# Altium PCB DC116A_PCB.PcbDoc (part 1 of 5)
Units mil, origin at the board's own origin, x right, y up, seen from the top; angles counter-clockwise.
Board outline 3300 x 2000 mil, 4 copper layers (Top Layer, GND1, PWR SPLIT PLANE, Bottom Layer), stack 58.64 mil thick; 315 components, 191 nets, 877 pads, 364 vias.
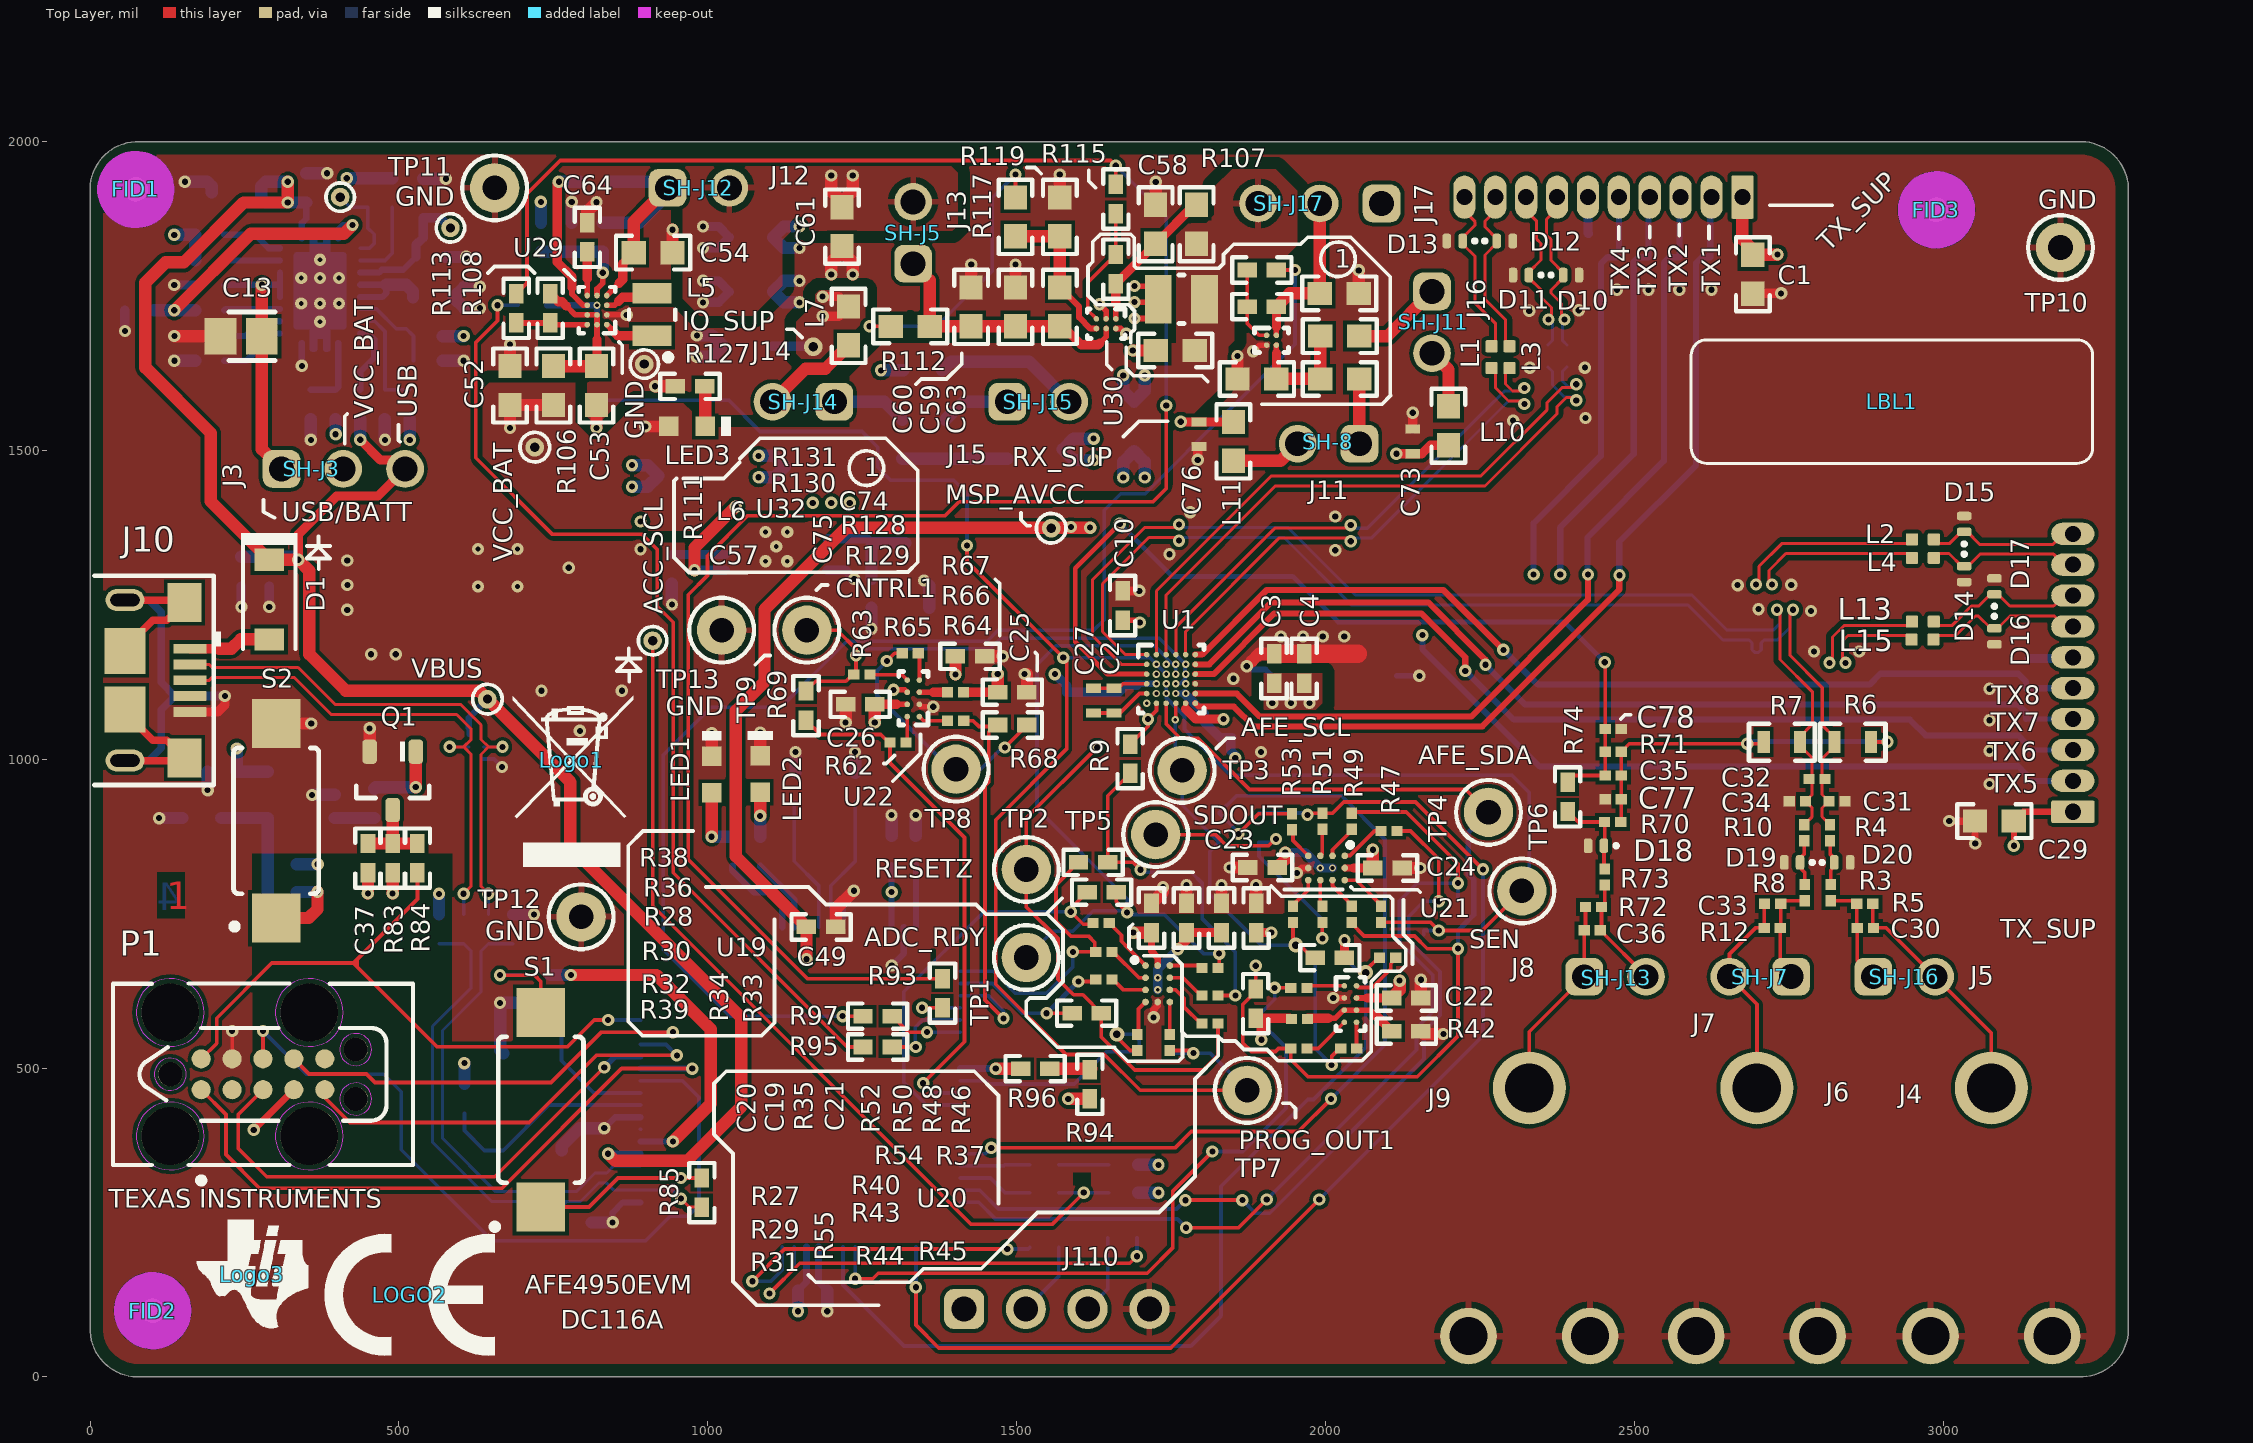
[diagram p0: Top Layer view]
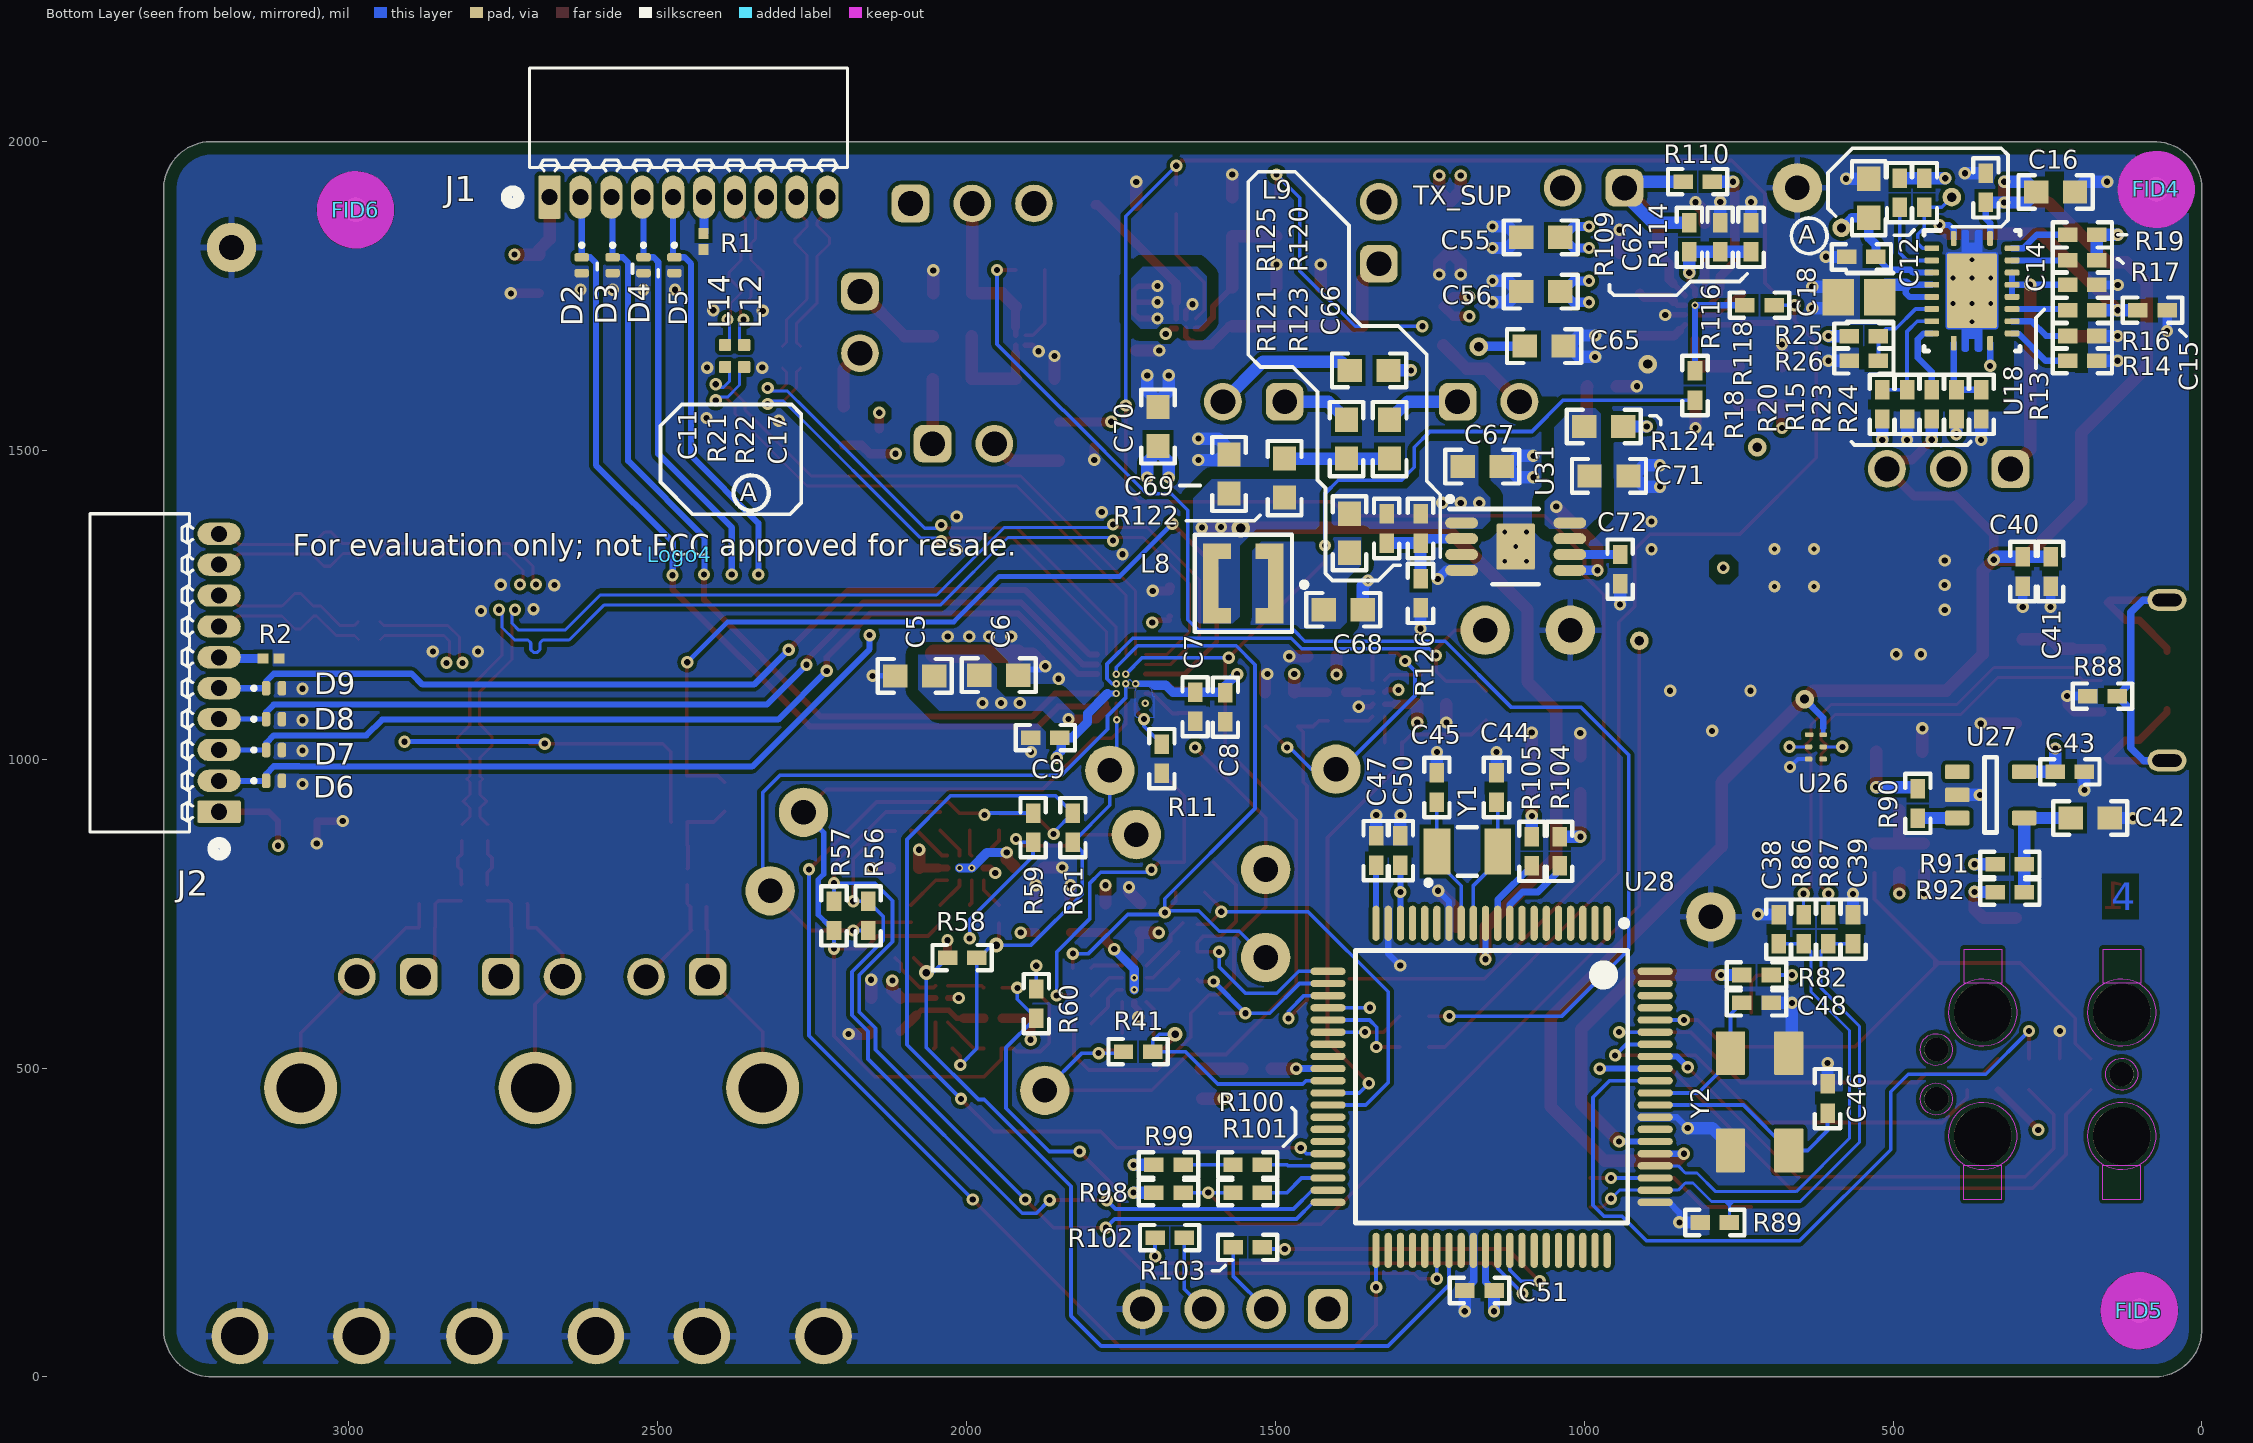
[diagram p1: Bottom Layer view, seen from below]
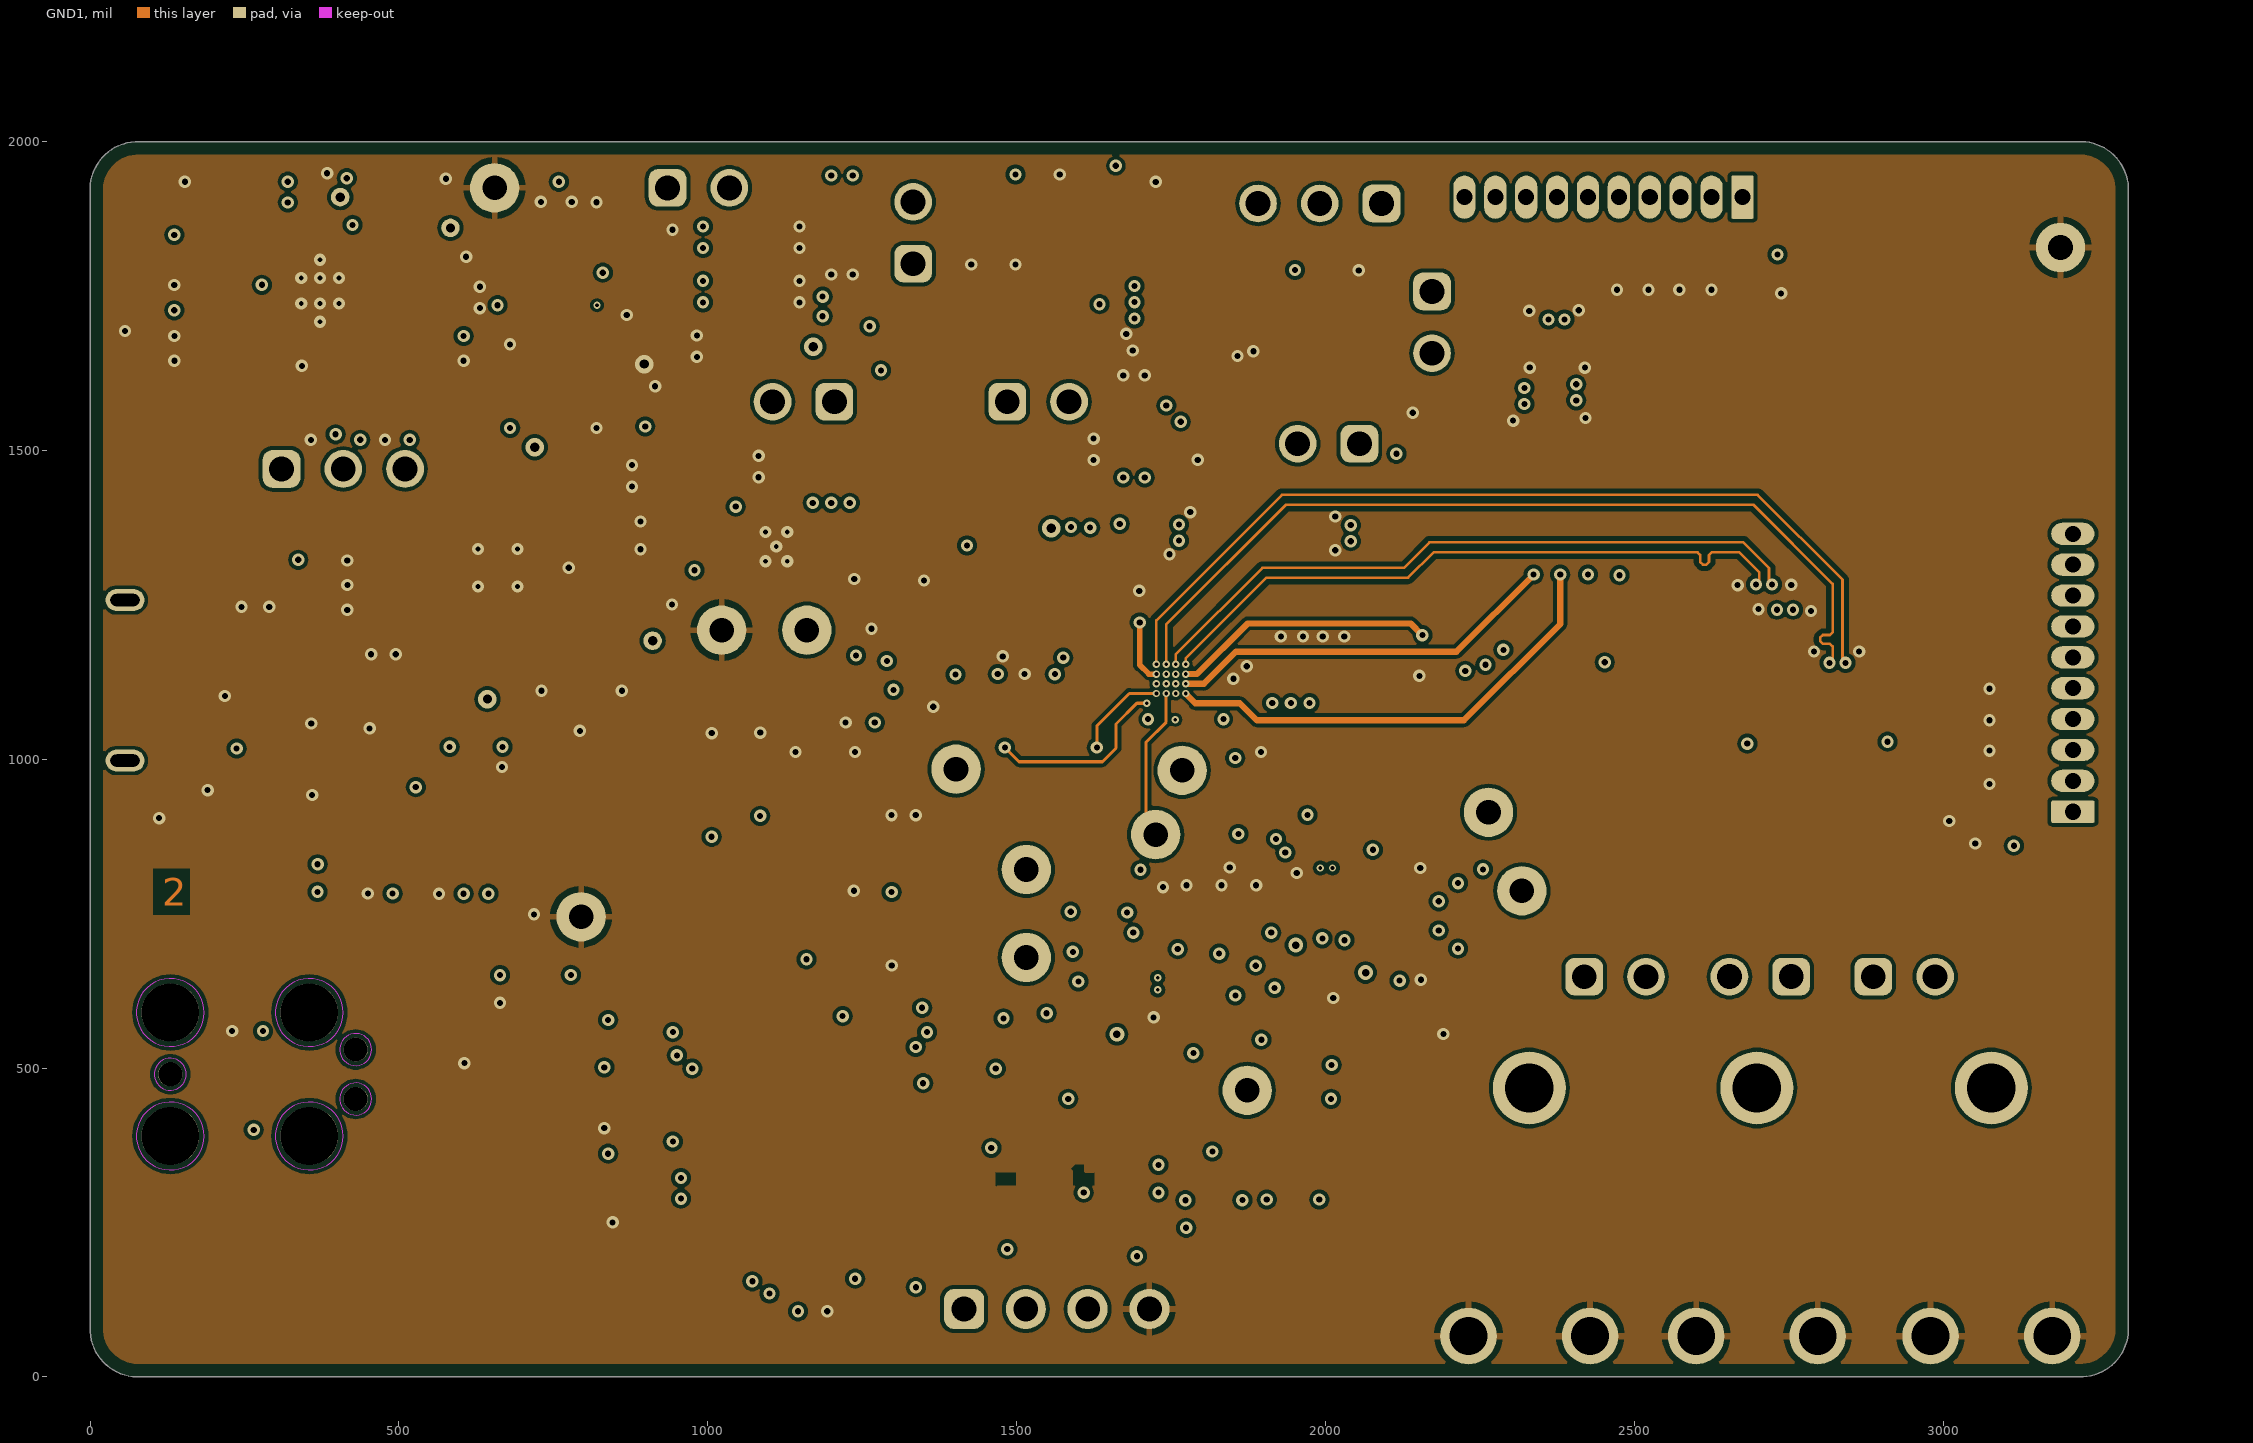
[diagram p2: GND1]
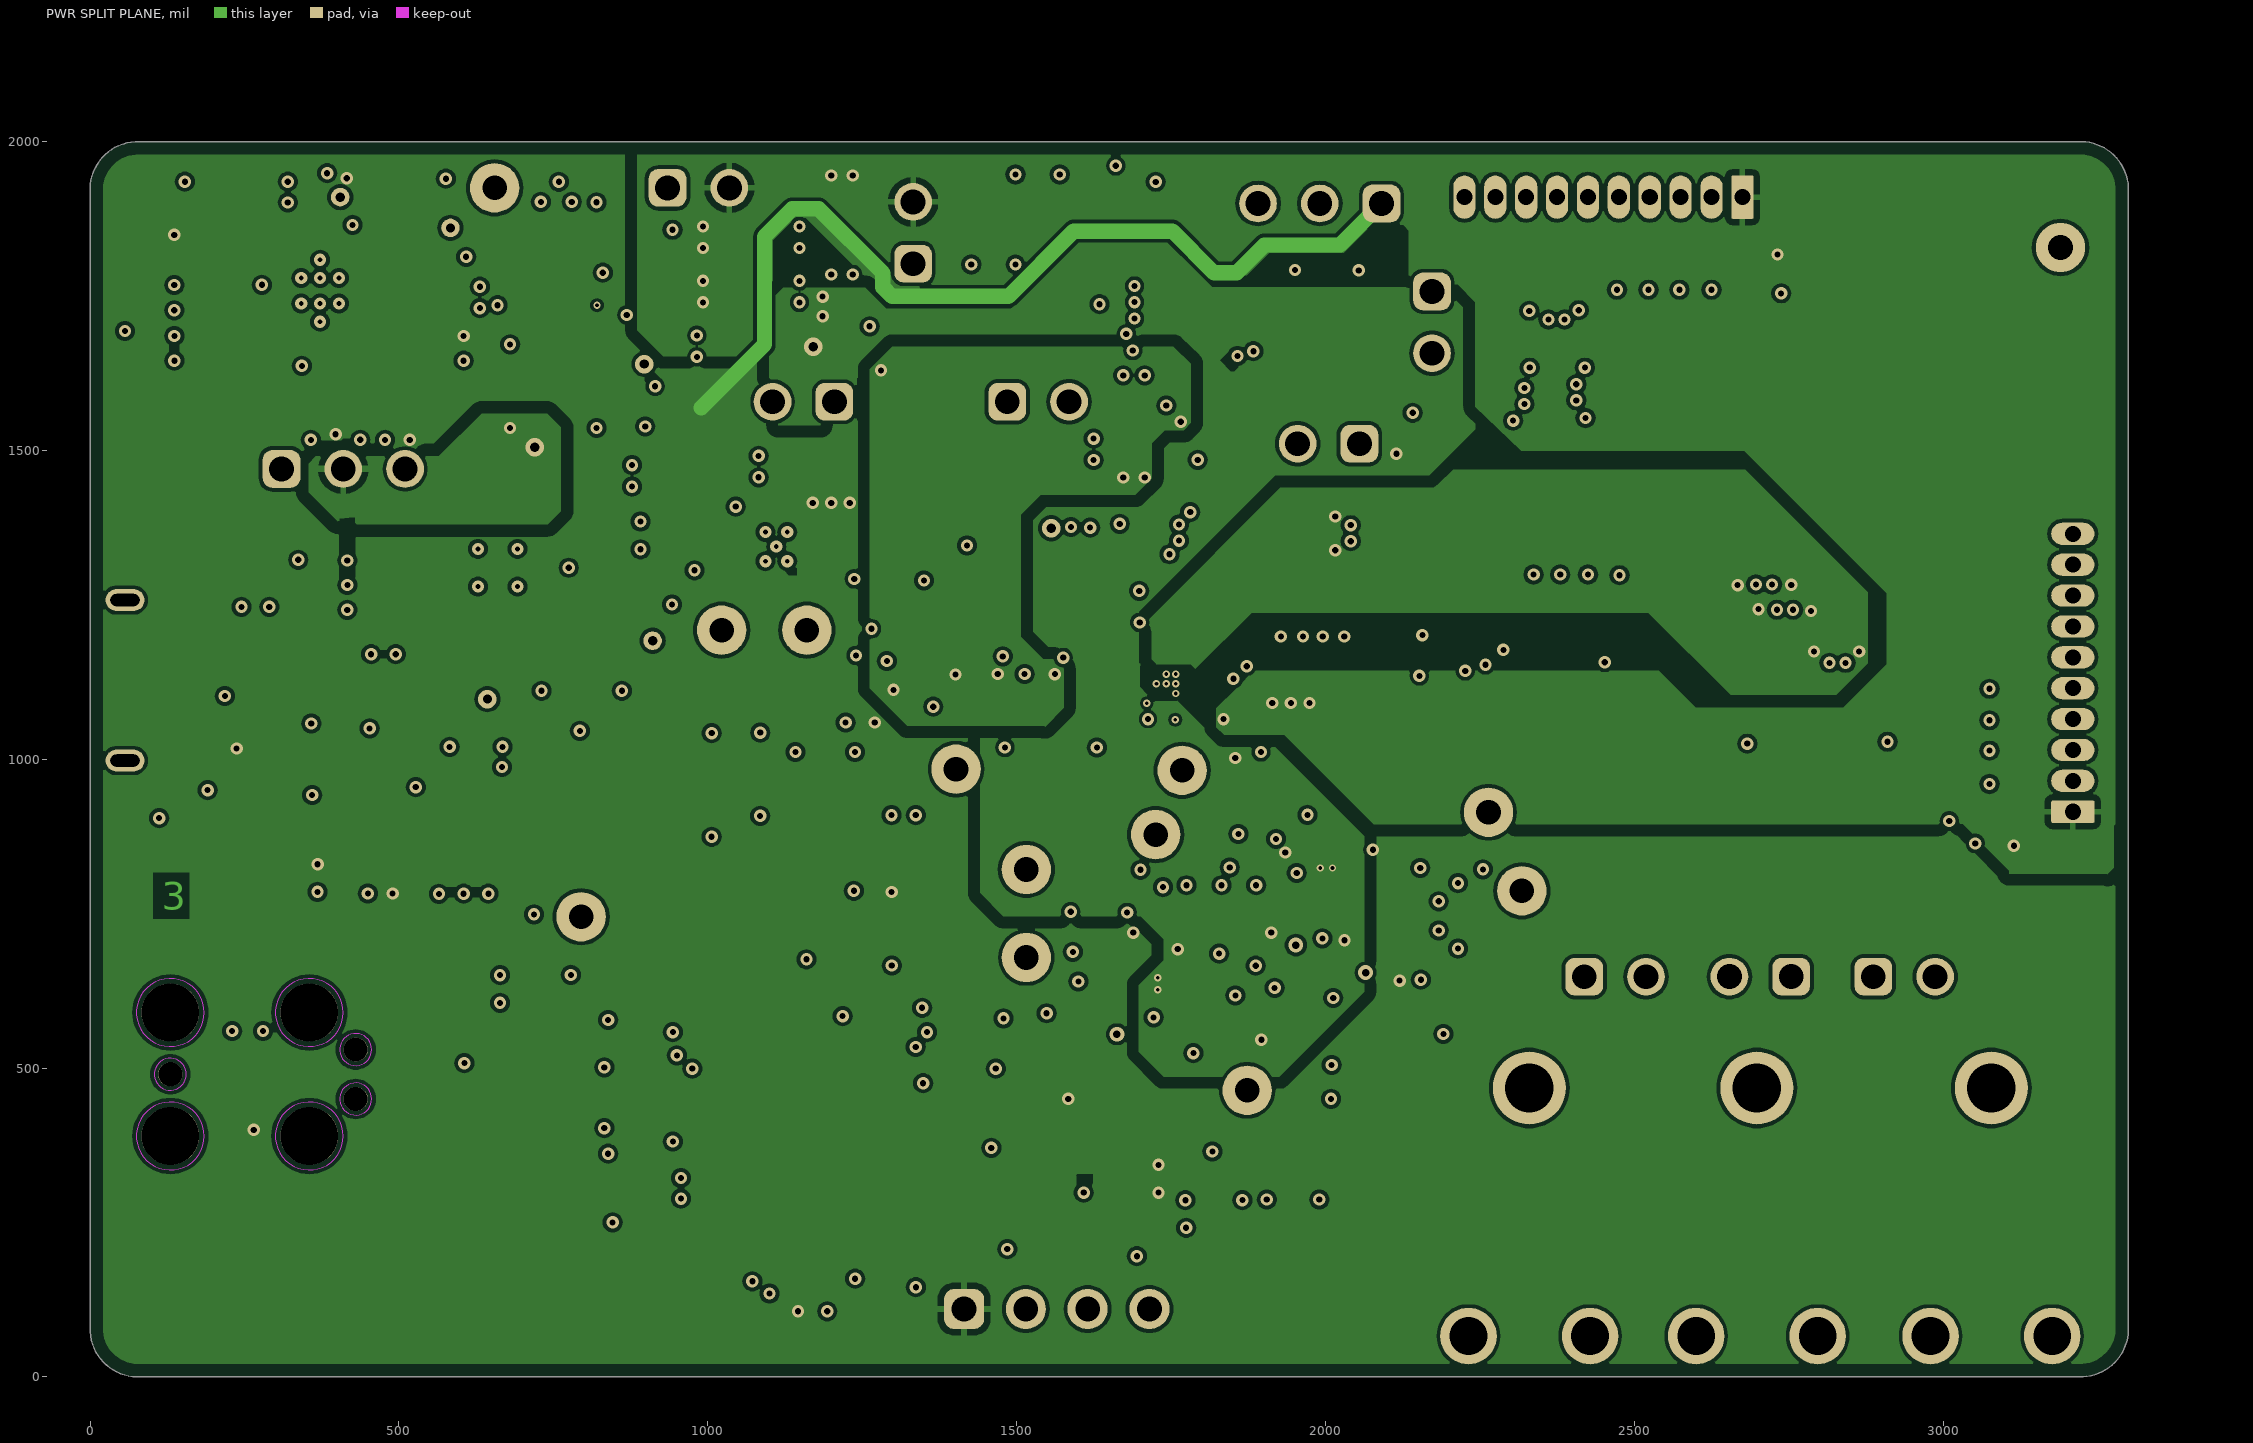
[diagram p3: PWR SPLIT PLANE]

## Layer stack, top to bottom
Top Solder: solder mask 0.4, Solder Resist, Dk 3.5
Top Layer: signal copper 0.579
Dielectric 1: dielectric 3.938, FR-4 HIGH Tg, Dk 4.2
GND1: signal copper 1.181
Dielectric2: core 47.244, FR-4 HIGH Tg, Dk 4.2
PWR SPLIT PLANE: signal copper 1.181
Dielectric3: prepreg 3.938, FR-4 HIGH Tg, Dk 4.2
Bottom Layer: signal copper 0.579
Bottom Solder: solder mask 0.4, Solder Resist, Dk 3.5

## Board outline
0,80 0,1924 cw(c78,1922) 80,2000 3224,2000 cw(c3222,1922) 3300,1920 3300,76 cw(c3222,78) 3220,0 76,0 cw(c78,78)

## Design rules (kind name [scope] priority, off if disabled: settings)
AcuteAngle [All] p1: minimum=4.50000000000000E+0001 checktracksonly=FALSE
AssemblyTestPointUsage [All] p1: valid=2
AssemblyTestpoint [All] p1 off: testpointundercomponent=TRUE minsize=30 maxsize=100 preferedsize=60 minholesize=0 maxholesize=40 preferedholesize=32 testpointgrid=1 usegrid=TRUE gridtolerance=0.01 allowsidetop=TRUE allowsidebottom=TRUE
BoardOutlineClearance BoardOutlineClearance_Poly [OnCopper and IsPoly] p1: gap=21 ignorepadtopadclearanceinfootprint=FALSE
Clearance U29 [WithinRoom('DC116_MSP430')] p1: gap=5 ignorepadtopadclearanceinfootprint=FALSE
Clearance u18 [WithinRoom('RoomDefinition')] p2: gap=5.9 ignorepadtopadclearanceinfootprint=FALSE except(5.2: Arc-Via Track-Via SMDPad-Via)
Clearance Clearance_P1 [HasFootprint('Tag_TC2050')or IsTrack vs IsKeepOut or IsFill] p3: gap=0 ignorepadtopadclearanceinfootprint=FALSE
Clearance Clearance_U1 [WithinRoom('111')] p4: gap=5 ignorepadtopadclearanceinfootprint=FALSE except(3.75: Via-Via; 4.5: Arc-Via Track-Via)
Clearance CONNECTORS [IsKeepOut vs InComponentClass('OVERLAPP')] p5: gap=0 ignorepadtopadclearanceinfootprint=FALSE
Clearance [InAnyDifferentialPair] p6: gap=5.99 ignorepadtopadclearanceinfootprint=FALSE except(8: Arc-Fill Arc-Poly Arc-Region Track-Fill Track-Poly Track-Region)
Clearance Clearance_Fiducial [IsKeepOut and InComponentClass('FiducialMark')] p7: gap=0 ignorepadtopadclearanceinfootprint=FALSE
Clearance DIFF_TO_SHAPE [InDifferentialPairClass('100') vs InNet('GND')] p8: gap=8 ignorepadtopadclearanceinfootprint=FALSE except(0: Arc-Hole Track-Hole SMDPad-Hole THPad-Hole Via-Hole Fill-Hole Poly-Hole Region-Hole Text-Hole; 7.5: SMDPad-SMDPad)
Clearance Clearance_1 [All] p9: gap=5.99 ignorepadtopadclearanceinfootprint=FALSE except(0: Arc-Hole Track-Hole SMDPad-Hole THPad-Hole Via-Hole Fill-Hole Poly-Hole Region-Hole Text-Hole; 2: Arc-Arc Arc-Track; 6: Via-Poly; 20: Poly-Poly)
Clearance SAMENET [All] p10: gap=3 ignorepadtopadclearanceinfootprint=FALSE except(0: Arc-SMDPad Track-Track Track-SMDPad Track-Poly Track-Region SMDPad-Via SMDPad-Hole Via-Region Region-Hole; 6: Arc-Fill Arc-Poly Arc-Region Track-Fill)
Clearance Clearance_Poly2poly [InPolygon vs InPolygon] p11: gap=15 ignorepadtopadclearanceinfootprint=FALSE except(0: Arc-Hole Track-Hole SMDPad-Hole THPad-Hole Via-Hole Fill-Hole Poly-Hole Region-Hole Text-Hole)
Clearance Clearance_Poly2NPTH [InComponent('P1') vs inpoly] p12: gap=12 ignorepadtopadclearanceinfootprint=FALSE except(0: Arc-Hole Track-Hole SMDPad-Hole THPad-Hole Via-Hole Fill-Hole Poly-Hole Region-Hole Text-Hole)
Clearance Clearance_Keepouts [((IsTrack Or IsArc) And Not InPoly) And IsFree and IsKeepOut vs ((IsTrack Or IsArc) And Not InPoly) And IsFree and IsKeepOut] p13: gap=0 ignorepadtopadclearanceinfootprint=FALSE
Clearance Clearance_Poly [InPolygon] p14: gap=8 ignorepadtopadclearanceinfootprint=FALSE except(0: Arc-Hole Track-Hole SMDPad-Hole THPad-Hole Via-Hole Fill-Hole Poly-Hole Region-Hole Text-Hole)
ComponentClearance ComponentClearance_Shunt [InComponentClass('Header') vs InComponentClass('Shunt')or HasFootprint('TE_881545-2')] p1: gap=0 collisioncheckmode=3 verticalgap=0 showdistances=FALSE
ComponentClearance [All] p2: gap=5 collisioncheckmode=3 verticalgap=5 showdistances=FALSE
ComponentClearance ComponentClearance_MountingHoles_FiducialMarks [InComponentClass('Mounting Holes') vs InComponentClass('FiducialMark')] p3: gap=50 collisioncheckmode=3 verticalgap=10 showdistances=FALSE
ComponentClearance ComponentClearance_Logo [InComponentClass('Logo')] p4: gap=50 collisioncheckmode=3 verticalgap=10 showdistances=FALSE
ComponentClearance ComponentClearance_ScrewToNut [(HasFootprint('NY PMS 440 0025 PH')) vs (HasFootprint('Keystone_1902C'))] p5: gap=5 collisioncheckmode=3 verticalgap=10 showdistances=FALSE
ComponentClearance ComponentClearance_MountingHoles [InComponentClass('Mounting Holes')] p6: gap=250 collisioncheckmode=3 verticalgap=100000 showdistances=FALSE
ComponentClearance ComponentClearance_SmallPassives [HasFootprint('0201*') or HasFootprint('0402*') or HasFootprint('0508') or HasFootprint('0603*') or HasFootprint('0612') or HasFootprint('0805*') or HasFootprint('0815*') or HasFootprint('0830*') or HasFootprint('1206*') or HasFootprint('1210*') or HasFootprint('1808*') or HasFootprint('1812*') or HasFootprint('1825*') or HasFootprint('2010*') or HasFootprint('2220*') or HasFootprint('2225*') or HasFootprint('2512*') or HasFootprint('2728*') or HasFootprint('3518*') vs HasFootprint('0201*') or HasFootprint('0402*') or HasFootprint('0508') or HasFootprint('0603*') or HasFootprint('0612') or HasFootprint('0805*') or HasFootprint('0815*') or HasFootprint('0830*') or HasFootprint('1206*') or HasFootprint('1210*') or HasFootprint('1808*') or HasFootprint('1812*') or HasFootprint('1825*') or HasFootprint('2010*') or HasFootprint('2220*') or HasFootprint('2225*') or HasFootprint('2512*') or HasFootprint('2728*') or HasFootprint('3518*')] p7: gap=14.96 collisioncheckmode=3 verticalgap=10 showdistances=FALSE
ComponentClearance ComponentClearance_THtoSMT [IsThruComponent vs IsSMTComponent] p8: gap=19 collisioncheckmode=3 verticalgap=30 showdistances=FALSE
ComponentClearance ComponentClearance_THtoTH [IsThruComponent vs IsThruComponent] p9: gap=25 collisioncheckmode=3 verticalgap=30 showdistances=FALSE
DiffPairsRouting 100_ohm [InDifferentialPairClass('All Differential Pairs')] p1: maxlimit=11.75 minlimit=11 mostfreqgap=11.75 toplayer_mingap=11.1 toplayer_maxgap=11.1 toplayer_prefgap=11.1 toplayer_minwidth=4.9 toplayer_maxwidth=4.9 toplayer_prefwidth=4.9 midlayer2_mingap=11.1 midlayer2_maxgap=11.1 midlayer2_prefgap=11.1 midlayer2_minwidth=4.9 midlayer2_maxwidth=4.9 midlayer2_prefwidth=4.9 midlayer3_mingap=11.75 midlayer3_minwidth=4.25 midlayer3_maxwidth=4.25 midlayer3_prefwidth=4.25 bottomlayer_maxgap=11 bottomlayer_prefgap=11 bottomlayer_minwidth=5 bottomlayer_maxwidth=5 bottomlayer_prefwidth=5 maxuncoupledlength=500
FabricationTestPointUsage TestPointUsage [All] p1: valid=2 allowmultiple=TRUE
FabricationTestpoint Testpoint [All] p1 off: side=3 testpointundercomponent=TRUE minsize=40 maxsize=100 preferedsize=60 minholesize=0 maxholesize=40 preferedholesize=32 testpointgrid=1 allowsidetop=TRUE allowsidebottom=TRUE usegrid=TRUE gridtolerance=0.01
FanoutControl Fanout_LCC [IsLCC] p1: bgadir=Out bgaviamode=Centered fanoutstyle=Auto fanoutdirection=Alternating viagrid=1 // Fanout_LCC (Default Rule)
FanoutControl Fanout_BGA [IsBGA] p2: bgadir=Out bgaviamode=Centered fanoutstyle=Auto fanoutdirection=Alternating viagrid=1 // Fanout_BGA (Default Rule)
FanoutControl Fanout_Default [All] p4: bgadir=Out bgaviamode=Centered fanoutstyle=Auto fanoutdirection=Alternating viagrid=1 // Fanout_Default (Default Rule)
FanoutControl Fanout_Small [(CompPinCount < 5)] p5: bgadir=Out bgaviamode=Centered fanoutstyle=Auto fanoutdirection=OutThenIn viagrid=1 // Fanout_Small (Default Rule)
HoleSize [All] p1: absolutevalues=TRUE maxlimit=251 minlimit=6 maxpercent=80.000 minpercent=20.000
HoleToHoleClearance [All] p1: gap=9.6 allowstackedmicrovias=TRUE
MinimumAnnularRing MinimumAnnularRing_J21 [InComponent('J21')] p1: minimumring=4.8
MinimumAnnularRing MinimumAnnularRing_Via [IsVia] p2: minimumring=2
MinimumAnnularRing MinimumAnnularRing_j22 [InComponent('J22')] p3: minimumring=4.8
MinimumAnnularRing MinimumAnnularRing_ThermalPadVias [IsVia and InAnyComponent] p4: minimumring=5.91
MinimumAnnularRing [All] p5: minimumring=5
MinimumSolderMaskSliver MinimumSolderMaskSliver_Logo [InComponentClass('Logo') vs InComponentClass('Logo')] p1: minsoldermaskwidth=0.7
MinimumSolderMaskSliver [All] p2: minsoldermaskwidth=3
PlaneConnect [All] p1: planeconnectstyle=Direct reliefexpansion=10 reliefentries=4 reliefconductorwidth=10 reliefairgap=10
PolygonConnect [All] p1: thpad.connectstyle=Relief thpad.reliefconductorwidth=10 thpad.reliefentries=4 thpad.polygonreliefangle="90 Angle" thpad.airgapwidth=10 smdpad.connectstyle=Direct smdpad.reliefconductorwidth=10 smdpad.reliefentries=4 smdpad.polygonreliefangle="90 Angle" smdpad.airgapwidth=10 via.connectstyle=Direct via.reliefconductorwidth=10 via.reliefentries=4 via.polygonreliefangle="90 Angle" via.airgapwidth=10
RoomDefinition 111 [False] p1: confinementstyle=ConfineIn formatcopy=TRUE lockcomponents=FALSE outline 1676,1189.49 1835.27,1189.49 1835.27,1052 1676,1052
RoomDefinition DC116_MSP430 [InComponentClass('DC116_MSP430')] p2: confinementstyle=ConfineOut formatcopy=TRUE lockcomponents=FALSE outline 760,1763.22 867.56,1763.22 867.56,1667 760,1667
RoutingVias [All] p1: holewidth=10 width=25 viastyle="Through Hole" minholewidth=6 minwidth=10 maxholewidth=25 maxwidth=65
SilkToBoardRegionClearance [Not ((IsComment or IsDesignator) And (Hide <> 'False')) and not InRegion(1000,500,4000,800)] p1:
SilkToSilkClearance SilkToSilkClearance_Pb-FreeLogo [(HasFootprint('Pb-Free_Overlay_Medium') OR HasFootprint('Pb-Free_Overlay_Small')) vs (HasFootprint('Pb-Free_Overlay_Medium') OR HasFootprint('Pb-Free_Overlay_Small'))] p1: silktosilkclearance=0
SilkToSilkClearance [All] p2: silktosilkclearance=3
SilkToSolderMaskClearance SilkToComponentPadClearance [(IsPad or IsFill or IsRegion) and InAnycomponent] p1: minsilkscreentomaskgap=2 clearancetoexposedcopper=TRUE
SilkToSolderMaskClearance "Silk to Solder Mask Opening" [All] p2: minsilkscreentomaskgap=2 clearancetoexposedcopper=FALSE
SolderMaskExpansion [All] p1: expansion=1.97
Width PWR [InNetClass('PWR')] p1: maxlimit=30 minlimit=6 preferedwidth=15
Width [All] p2: maxlimit=100 minlimit=5 preferedwidth=6 toplayer_minwidth=6 midlayer2_prefwidth=5 midlayer3_prefwidth=5 bottomlayer_minwidth=6 minimp=50.000000 maximp=50.000000 favimp=50.000000 checkconnectedcopper=TRUE
13 further rules are at their usual default settings.

## Classes and differential pairs
component class DC116_MSP430: C37 C38 C39 C40 C41 C42 C43 C44 C45 C46 C47 C48 C49 C50 C51 D1 J10 J110 LED1 LED2 P1 Q1 R82 R83 R84 R85 R86 R87 R88 R89 R90 R91 R92 R93 R94 R95 R96 R97 R98 R99 R100 R101 R102 R103 R104 R105 S1 S2 TP12 U26 U27 U28 Y1 Y2
component class Label: LBL1
component class DC116_Hardware: !PCB1 FID1 FID2 FID3 FID4 FID5 FID6 H2 LBL1 Logo1 LOGO2 Logo3 Logo4 PCB2 ZZ1 ZZ2 ZZ3 ZZ4
component class DC116_ECG: C30 C31 C32 C33 C34 C35 C36 C77 C78 D18 D19 D20 J4 J5 J6 J7 J8 J9 R3 R4 R5 R6 R7 R8 R10 R12 R70 R71 R72 R73 R74 SH-8 SH-J5 SH-J7
component class DC116_AFE4950: C1 C2 C3 C4 C5 C6 C7 C8 C9 C10 C27 C29 D2 D3 D4 D5 D6 D7 D8 D9 D10 D11 D12 D13 D14 D15 D16 D17 J1 J2 L1 L2 L3 L4 L12 L13 L14 L15 R1 R2 R9 R11 TP1 TP2 TP3 TP4 TP5 TP6 TP7 TP8 TP9 TP10 U1
component class Header: J3 J5 J7 J8 J11 J12 J13 J14 J15 J16 J17 J110
component class DC116_PwrMgmt: C52 C53 C54 C55 C56 C57 C58 C59 C60 C61 C62 C63 C64 C65 C66 C67 C68 C69 C70 C71 C72 C73 C74 C75 C76 J11 J12 J13 J14 J15 J16 J17 L5 L6 L7 L8 L9 L10 L11 LED3 R106 R107 R108 R109 R110 R111 R112 R113 R114 R115 R116 R117 R118 R119 R120 R121 R122 R123 R124 R125 R126 R127 R128 R129 R130 R131 SH-J11 SH-J12 SH-J13 SH-J14 SH-J15 SH-J16 SH-J17 TP13 U29 U30 U31 U32
component class DC116_Contd: C19 C20 C21 C22 C23 C24 C25 C26 R27 R28 R29 R30 R31 R32 R33 R34 R35 R36 R37 R38 R39 R40 R41 R42 R43 R44 R45 R46 R47 R48 R49 R50 R51 R52 R53 R54 R55 R56 R57 R58 R59 R60 R61 R62 R63 R64 R65 R66 R67 R68 R69 U19 U20 U21 U22
component class DC116_BatteryMgmt: C11 C12 C13 C14 C15 C16 C17 C18 J3 R13 R14 R15 R16 R17 R18 R19 R20 R21 R22 R23 R24 R25 R26 SH-J3 TP11 U18
component class Logo: Logo3
component class FiducialMark: FID1 FID2 FID3 FID4 FID5 FID6
component class AssemblyNote: ZZ1 ZZ2 ZZ3 ZZ4
differential pair IN_ECG: +IN_ECG_P -IN_ECG_N
differential pair IN4: +IN4_P -IN4_N
differential pair IN3: +IN3_P -IN3_N
differential pair PD4: +PD4_P -PD4_N
differential pair PD3: +PD3_P -PD3_N
differential pair PD2: +PD1_P -PD1_N
differential pair PD1: +PD2_P -PD2_N
differential pair MSP_USB: +MSP_USB_P -MSP_USB_N
differential pair MSP_USB_D: +MSP_USB_D_P -MSP_USB_D_N
differential pair IN: +IN_P -IN_N
differential pair IN2: +IN2_P -IN2_N

## Components (designator, comment, footprint, x,y, rotation, side; value= is the part's Value field where it differs from the comment)
C1 "Capacitor" 0603 2691.83,1785.09 r270 top value=10uF
C2 "GRM155R60J106ME44D" 0402_070 1657.76,1095 r90 top value=10uF
C3 "C1005X7R1H102M050BE" 0402 1916.84,1147 r90 top value=1000pF
C4 "0402YC104KAT2A" 0402 1965.52,1147 r270 top value=0.1uF
C5 "Capacitor" 0603 2084,1135 r0 bottom value=10uF
C6 "Capacitor" 0603 1948,1136 r180 bottom value=10uF
C7 "C1005X7R1H102M050BE" 0402 1630,1085 r270 bottom value=1000pF
C8 "0402YC104KAT2A" 0402 1581,1084.39 r90 bottom value=0.1uF
C9 "0402YC104KAT2A" 0402 1872.49,1035 r180 bottom value=0.1uF
C10 "0402YC104KAT2A" 0402 1671.81,1248.9 r270 top value=0.1uF
C11 "Capacitor" 0603 539.4,1908.19 r90 bottom locked value=10uF
C12 "0402YC104KAT2A" 0402 551.4,1813.19 r0 bottom value=0.1uF
C13 "Cap_Polarized" 2012-10 244.69,1684.71 r180 top locked value=22uF
C14 "0402YC104KAT2A" 0402 193.78,1767.87 r0 bottom locked value=0.1uF
C15 "0402YC104KAT2A" 0402 80,1727 r180 bottom value=0.1uF
C16 "EMK107BBJ106MA-T" 0603 236.91,1918.19 r180 bottom locked value=10uF
C17 "0402YC104KAT2A" 0402 350,1925 r270 bottom locked value=0.1uF
C18 "Cap_Polarized" 2012-10 555.05,1747.65 r0 bottom locked value=22uF
C19 "0402YC104KAT2A" 0402 1775.07,743.01 r90 top value=0.1uF
C20 "0402YC104KAT2A" 0402 1718.37,743.01 r270 top value=0.1uF
C21 "0402YC104KAT2A" 0402 1887.78,743.01 r270 top locked value=0.1uF
C22 "0402YC104KAT2A" 0402 2130.88,613.53 r0 top locked value=0.1uF
C23 "0402YC104KAT2A" 0402 1898.09,824.78 r180 top value=0.1uF
C24 "0402YC104KAT2A" 0402 2100.45,823.97 r180 top value=0.1uF
C25 "0402YC104KAT2A" 0402 1493.14,1108.5 r0 top value=0.1uF
C26 "0402YC104KAT2A" 0402 1246.82,1088.82 r0 top value=0.1uF
C27 "GRM155R60J106ME44D" 0402_070 1624.76,1095 r90 top value=10uF
C29 "Capacitor" 0603 3083,899.75 r180 top value=10uF
C30 "C0603X5R1E473K030BB" 0201_033 2874.01,727.02 r0 top value=0.047uF
C31 "GRM0335C1E470JA01D" 0201_033 2827.99,932 r0 top value=47pF
C32 "C0603C0G1E101J030BA" 0201_033 2795.99,968 r180 top value=100pF
C33 "C0603X5R1E473K030BB" 0201_033 2723.99,765.97 r180 top value=0.047uF
C34 "GRM0335C1E470JA01D" 0201_033 2763.99,932 r180 top value=47pF
C35 "C0603X5R1E102K030BA" 0201_033 2465.94,973.65 r0 top value=1000pF
C36 "C0603X5R1E473K030BB" 0201_033 2432,723 r180 top value=0.047uF
C37 "Capacitor" 0402 450,840 r270 top locked value=2200pF
C38 "500R07S100JV4T" 0402 685,725 r90 bottom locked value=10pF
C39 "500R07S100JV4T" 0402 565,725 r90 bottom locked value=10pF
C40 "0402YC104KAT2A" 0402 290,1304 r90 bottom value=0.1uF
C41 "Capacitor" 0402_065 245,1304 r270 bottom locked value=4.7uF
C42 "Capacitor" 0603 181,904.84 r180 bottom locked value=2.2uF
C43 "0402YC104KAT2A" 0402 213.88,979.65 r0 bottom value=0.1uF
C44 "CL05C120JB5NNNC" 0402 1142.13,954.3 r90 bottom locked value=12pF
C45 "CL05C120JB5NNNC" 0402 1238.58,954.3 r90 bottom locked value=12pF
C46 "500R07S100JV4T" 0402 606.14,450.68 r270 bottom locked value=10pF
C47 "04026D474KAT2A" 0402 1337.01,852.17 r90 bottom locked value=0.47uF
C48 "500R07S100JV4T" 0402 721.14,605.68 r180 bottom locked value=10pF
C49 "0402YC104KAT2A" 0402 1183.46,728.54 r180 top value=0.1uF
C50 "0402YC104KAT2A" 0402 1297.64,852.17 r270 bottom value=0.1uF
C51 "0402YC104KAT2A" 0402 1169.68,140 r180 bottom locked value=0.1uF
C52 "Capacitor" 0603 680,1605 r90 top locked value=10uF
C53 "Capacitor" 0603 820,1605 r270 top locked value=10uF
C54 "Capacitor" 0603 911.5,1820 r0 top locked value=10uF
C55 "Capacitor" 0603 1070.43,1845 r0 bottom locked value=10uF
C56 "Capacitor" 0603 1070.43,1757 r0 bottom value=10uF
C57 "Capacitor" 0603 1756.82,1661.73 r180 top locked value=10uF
C58 "TMK107BJ105KA-T" 0603 1725.17,1866.03 r90 top locked value=1uF
C59 "Capacitor" 0603 1498.23,1732.34 r90 top locked value=10uF
C60 "Capacitor" 0603 1426.51,1732.34 r90 top locked value=10uF
C61 "Capacitor" 0603 1217.41,1862.29 r270 top locked value=10uF
C62 "500R07S100JV4T" 0402 780,1845 r90 bottom locked value=10pF
C63 "AC0603JRNPOYBN220" 0603 1569.95,1732.34 r90 top locked value=22pF
C64 "C1005X7R1H102M050BE" 0402 805,1845 r90 top locked value=1000pF
C65 "EMK107BBJ106MA-T" 0603 1065,1668.74 r180 bottom value=10uF
C66 "Capacitor" 0402 1265,1373.62 r270 bottom locked value=0.01uF
C67 "EMK107BBJ106MA-T" 0603 1165,1473.74 r180 bottom value=10uF
C68 "EMK107BBJ106MA-T" 0603 1390,1242 r180 bottom value=10uF
C69 "EMK107BBJ106MA-T" 0603 1575,1461.73 r90 bottom value=10uF
C70 "EMK107BBJ106MA-T" 0603 1690,1538.74 r90 bottom locked value=10uF
C71 "EMK107BBJ106MA-T" 0603 960,1458.74 r180 bottom value=10uF
C72 "Capacitor" 0402 942,1307.83 r270 bottom locked value=0.01uF
C73 "GRM155R60J106ME44D" 0402_070 2141.2,1514.5 r90 top locked value=10uF
C74 "TMK107BJ105KA-T" 0603 2022.39,1754.28 r0 top locked value=1uF
C75 "TMK107BJ105KA-T" 0603 1889.09,1615.7 r180 top locked value=1uF
C76 "GRM155R60J106ME44D" 0402_070 1795.34,1526.15 r270 top locked value=10uF
C77 "GRM0335C1E470JA01D" 0201_033 2465.88,935.25 r180 top value=47pF
C78 "C0603C0G1E101J030BA" 0201_033 2466,1049 r0 top value=100pF
D1 "DIODE_SCHOTTKY" SOD-123 290,1258.45 r270 top locked value=40V
D2 "TPD1E04U04DPYR" DPY0002A#1 2623,1799.8 r270 bottom
D3 "TPD1E04U04DPYR" DPY0002A#1 2573,1799.8 r270 bottom
D4 "TPD1E04U04DPYR" DPY0002A#1 2523,1799.8 r270 bottom
D5 "TPD1E04U04DPYR" DPY0002A#1 2473,1799.8 r270 bottom
D6 "TPD1E04U04DPYR" DPY0002A#1 3121.2,965 r180 bottom
D7 "TPD1E04U04DPYR" DPY0002A#1 3121.2,1015 r180 bottom
D8 "TPD1E04U04DPYR" DPY0002A#1 3121.2,1065 r180 bottom
D9 "TPD1E04U04DPYR" DPY0002A#1 3121.2,1115 r180 bottom
D10 "TPD1E04U04DPYR" DPY0002A#2 2397.7,1783.88 r0 top
D11 "TPD1E04U04DPYR" DPY0002A#2 2316.45,1783.88 r180 top
D12 "TPD1E04U04DPYR" DPY0002A#2 2290.34,1839 r0 top
D13 "TPD1E04U04DPYR" DPY0002A#2 2209.16,1839 r180 top
D14 "TPD1E04U04DPYR" DPY0002A#2 3034,1299.64 r270 top
D15 "TPD1E04U04DPYR" DPY0002A#2 3034,1381 r90 top
D16 "TPD1E04U04DPYR" DPY0002A#2 3083,1199.03 r270 top
D17 "TPD1E04U04DPYR" DPY0002A#2 3083,1280 r90 top
D18 "TPD1E04U04DPYR" DPY0002A#2 2438,859.99 r180 top
D19 "TPD1E04U04DPYR" DPY0002A#2 2755.47,832.93 r180 top
D20 "TPD1E04U04DPYR" DPY0002A#2 2836.49,832.93 r0 top
FID1 "Fiducial" Fiducial10-30 74.11,1922.39 r180 top locked
FID2 "Fiducial" Fiducial10-30 101.45,107.35 r90 top locked
FID3 "Fiducial" Fiducial10-30 2989.05,1889.49 r0 top locked
FID4 "Fiducial" Fiducial10-30 74.11,1922.39 r180 bottom locked
FID5 "Fiducial" Fiducial10-30 101.45,107.35 r90 bottom locked
FID6 "Fiducial" Fiducial10-30 2989.05,1889.49 r180 bottom locked
J1 "Receptacle_10x1" CONN_851-43-010-20-001000 2450,1910 r0 bottom
J2 "Receptacle_10x1" CONN_851-43-010-20-001000 3210,1140 r270 bottom
J3 "Header_3x1" Samtec_TSW-103-07-T-S 410,1470 r0 top locked
J4 "41828" PlasticsOne_41828 3078,267 r0 top
J5 "Header_2x1" Samtec_TSW-102-07-T-S 2937,648.02 r0 top
J6 "41828" PlasticsOne_41828 2698.5,267 r0 top
J7 "Header_2x1" Samtec_TSW-102-07-T-S 2704,648.05 r180 top
J8 "Header_2x1" Samtec_TSW-102-07-T-S 2469,647.98 r0 top
J9 "41828" PlasticsOne_41828 2330,267 r0 top
J10 "CONN_USB_5Pos-6Shld" FCI_10118193-0001LF -0.42,1127.8 r270 top
J11 "Header_2x1" Samtec_TSW-102-07-T-S 2004.99,1510.87 r180 top locked
J12 "Header_2x1" Samtec_TSW-102-07-T-S 985,1925 r0 top locked
J13 "Header_2x1" Samtec_TSW-102-07-T-S 1332.51,1852.29 r90 top locked
J14 "Header_2x1" Samtec_TSW-102-07-T-S 1155,1578.74 r180 top locked
J15 "Header_2x1" Samtec_TSW-102-07-T-S 1535,1578.74 r0 top locked
J16 "Header_2x1" Samtec_TSW-102-07-T-S 2172.6,1707.35 r270 top locked
J17 "Header_3x1" Samtec_TSW-103-07-T-S 1990.89,1899.79 r180 top locked
J110 "Header_4x1" TSW-104-07-G-S 1565,110 r0 top locked
L1 "MMZ1005S182ET000" MMZ1005-E 2269,1650.87 r90 top
L2 "MMZ1005S182ET000" MMZ1005-E 2967.18,1356 r0 top
L3 "MMZ1005S182ET000" MMZ1005-E 2298,1650.87 r90 top
L4 "MMZ1005S182ET000" MMZ1005-E 2967.18,1326 r0 top
L5 "Inductor_Iron" DFE201612C 910,1720 r90 top locked value=1.5uH
L6 "Inductor_Iron" WE_LQS_252012 1766.93,1744.51 r180 top locked value=2.2uH
L7 "Ferrite_Bead" 0603 1228.15,1701.58 r90 top locked value="120 ohm"
L8 "Inductor_Iron" LPS3010 1552,1284.71 r0 bottom value=10uH
L9 "Ferrite_Bead" 0603 1348.37,1629.49 r180 bottom locked value="120 ohm"
L10 "Ferrite_Bead" 0603 2199,1540 r270 top value="120 ohm"
L11 "Ferrite_Bead" 0603 1851.03,1514.52 r90 top locked value="120 ohm"
L12 "MMZ1005S182ET000" MMZ1005-E 2360,1652.85 r90 bottom
L13 "MMZ1005S182ET000" MMZ1005-E 2967.18,1222.75 r0 top
L14 "MMZ1005S182ET000" MMZ1005-E 2391,1652.9 r90 bottom
L15 "MMZ1005S182ET000" MMZ1005-E 2966.57,1193.75 r0 top
LBL1 "THT-14-423-10" Label_650x200 2917,1579 r180 top
LED1 "LED" LED_SML-LX0603GW 1006.25,975 r90 top locked value=Green
LED2 "LED" SML-LX0603SRW_SuperRed 1084.84,975.89 r90 top value="Super Red"
LED3 "LED" LED_SML-LX0603GW 966.54,1538.74 r0 top locked value=Green
Logo1 "WEEE logo" WEEE_Minimum 780,998 r0 top
LOGO2 "CE Mark" CE_Mark_5mm 517.56,133 r0 top
Logo3 "Texas Instruments" TI_Symbol_Overlay_Small 263,166.49 r0 top
Logo4 "FCC disclaimer" FCC_disclaimer 2464,1331 r180 bottom
P1 "Tag_TC2050" Tag_TC2050 280,490 r90 top
Q1 "MMBT5089LT1G" SOT-23 490,965 r270 top locked value="25 V"
R1 "Resistor" 0201 2426,1838 r270 bottom value=0
R2 "Resistor" 0201 3126,1163 r180 bottom value=0
R3 "CRCW02010000Z0ED" 0201 2818,784.01 r90 top value=0
R4 "RC0201DR-07100KL" 0201 2817,880.99 r90 top value=100k
R5 "RC0201FR-0751KL" 0201 2873,765.97 r180 top value=51.0k
R6 "CRCW0603200MJPEAHR" 0603_HR 2853.53,1028 r180 top value=200Meg
R7 "CRCW0603200MJPEAHR" 0603_HR 2739,1028 r180 top value=200Meg
R8 "CRCW02010000Z0ED" 0201 2776,784.01 r90 top value=0
R9 "Resistor" 0402 1683.93,1001 r270 top value=499
R10 "RC0201DR-07100KL" 0201 2775,880.99 r90 top value=100k
R11 "Resistor" 0402 1683.93,1001 r90 bottom value=499k
R12 "RC0201FR-0751KL" 0201 2723.41,727.02 r0 top value=51.0k
R13 "Resistor" 0402 193.78,1727 r180 bottom locked value=47k
R14 "Resistor" 0402 193.78,1645.21 r0 bottom locked value=10.0k
R15 "Resistor" 0402 437.4,1574.43 r90 bottom locked value=10.0k
R16 "Resistor" 0402 193.78,1685.21 r180 bottom locked value=10.0k
R17 "Resistor" 0402 193.78,1807.87 r0 bottom locked value=10.0k
R18 "Resistor" 0402 517.4,1574.43 r90 bottom locked value=10.0k
R19 "Resistor" 0402 193.78,1849.06 r0 bottom locked value=10.0k
R20 "Resistor" 0402 477.4,1574.43 r90 bottom locked value=10.0k
R21 "Resistor" 0402 489.4,1917.19 r270 bottom locked value=10.0k
R22 "Resistor" 0402 449.4,1917.19 r270 bottom locked value=10.0k
R23 "Resistor" 0402 397.4,1574.43 r90 bottom locked value=10.0k
R24 "Resistor" 0402 357.4,1574.43 r270 bottom locked value=10.0k
R25 "Resistor" 0402 547.4,1685 r180 bottom locked value=10.0k
R26 "Resistor" 0402 547.4,1645 r0 bottom locked value=10.0k
R27 "Resistor" 0201 1812.93,662.08 r180 top locked value=0
R28 "Resistor" 0201 1636.87,734.88 r180 top value=0
R29 "Resistor" 0201 1812.94,617.57 r180 top locked value=0
R30 "Resistor" 0201 1641.29,688.15 r180 top locked value=0
R31 "Resistor" 0201 1812.94,572.26 r180 top locked value=0
R32 "Resistor" 0201 1641.29,643.4 r180 top locked value=0
R33 "Resistor" 0201 1748.08,541.52 r90 top locked value=0
R34 "Resistor" 0201 1695.36,541.52 r270 top locked value=0
R35 "Resistor" 0402 1831.76,743.01 r270 top locked value=499k
R36 "Resistor" 0402 1637.84,784.83 r0 top locked value=0
R37 "Resistor" 0201 2100.68,678.79 r180 top locked value=0
R38 "Resistor" 0402 1623.84,833.07 r180 top locked value=0
R39 "Resistor" 0402 1613.51,588.8 r180 top locked value=0
R40 "Resistor" 0201 1956.97,629.88 r0 top locked value=0
R41 "Resistor" 0402 1722.32,526.56 r0 bottom locked value=0
R42 "Resistor" 0402 2130.88,559.79 r180 top locked value=499k
R43 "Resistor" 0201 1957.91,579.31 r0 top value=0
R44 "Resistor" 0201 1956.97,531.78 r0 top locked value=0
R45 "Resistor" 0201 2037.81,531.78 r180 top locked value=0
R46 "Resistor" 0201 2090.1,748.93 r90 top locked value=0
R47 "Resistor" 0201 2103,884 r0 top value=0
R48 "Resistor" 0201 2042.58,748.93 r90 top locked value=0
R49 "Resistor" 0201 2042.58,899.58 r90 top locked value=0
R50 "Resistor" 0201 1995.05,748.93 r90 top locked value=0
R51 "Resistor" 0201 1995.05,899.58 r90 top locked value=0
R52 "Resistor" 0201 1947.53,748.93 r90 top locked value=0
R53 "Resistor" 0201 1946.07,898.79 r90 top value=0
R54 "Resistor" 0402 2007.17,678.79 r0 top locked value=10.0k
R55 "Resistor" 0402 1887.08,604.45 r270 top locked value=10.0k
R56 "Resistor" 0402 2159.27,746.4 r90 bottom locked value=0
R57 "Resistor" 0402 2214.57,746.4 r90 bottom locked value=0
R58 "Resistor" 0402 2007.17,678.79 r180 bottom locked value=0
R59 "Resistor" 0402 1892.29,889.21 r90 bottom locked value=0
R60 "Resistor" 0402 1887.08,604.45 r90 bottom locked value=0
R61 "Resistor" 0402 1827.89,889.21 r270 bottom locked value=0
R62 "Resistor" 0201 1308.06,1026.96 r180 top locked value=0
R63 "Resistor" 0201 1249.48,1136.99 r0 top locked value=0
R64 "Resistor" 0201 1401.34,1062.43 r0 top locked value=0
R65 "Resistor" 0201 1327.75,1171.52 r0 top locked value=0
R66 "Resistor" 0201 1401.31,1108.5 r0 top locked value=0
R67 "Resistor" 0402 1424.65,1166.51 r180 top locked value=499k
R68 "Resistor" 0402 1493.14,1055.43 r180 top locked value=0
R69 "Resistor" 0402 1159.13,1086.86 r90 top locked value=0
R70 "RC0201DR-07100KL" 0201 2464.99,898.25 r0 top value=100k
R71 "CRCW02010000Z0ED" 0201 2465.94,1012.25 r180 top value=0
R72 "RC0201FR-0751KL" 0201 2434,761 r0 top value=51.0k
R73 "CRCW02010000Z0ED" 0201 2452,809.53 r90 top value=0
R74 "CRCW040249K9FKED" 0402 2392,939 r90 top value=49.9k
R82 "Resistor" 0402 721.14,650.68 r180 bottom locked value=100
R83 "Resistor" 0402 490,840 r270 top locked value=47k
R84 "Resistor" 0402 530,840 r270 top locked value=0
R85 "Resistor" 0402 990.4,298.43 r90 top locked value=1.40k
R86 "Resistor" 0402 645,725 r90 bottom locked value=33
R87 "Resistor" 0402 605,725 r90 bottom locked value=33
R88 "Resistor" 0402 161,1102.21 r180 bottom locked value=33k
R89 "Resistor" 0402 788.62,250 r0 bottom locked value=1.00Meg
R90 "Resistor" 0402 460,928.46 r90 bottom locked value=100
R91 "Resistor" 0402 311.12,829.84 r0 bottom locked value=4.7k
R92 "Resistor" 0402 311.12,784.84 r180 bottom locked value=0
R93 "Resistor" 0402 1380,621.26 r270 top locked value=0
R94 "Resistor" 0402 1618.54,473.79 r270 top locked value=10.0k
R95 "Resistor" 0402 1275,534.17 r0 top locked value=0
R96 "Resistor" 0402 1530,499.21 r180 top locked value=10.0
R97 "Resistor" 0402 1275,584.17 r0 top locked value=0
R98 "Resistor" 0402 1673,298.35 r0 bottom locked value=4.7k
R99 "Resistor" 0402 1673,343.35 r0 bottom locked value=4.7k
R100 "Resistor" 0402 1545,343.35 r0 bottom locked value=10.0
R101 "Resistor" 0402 1545,298.35 r0 bottom locked value=10.0
R102 "Resistor" 0402 1671.14,225.54 r180 bottom locked value=0
R103 "Resistor" 0402 1544.83,209.73 r0 bottom locked value=0
R104 "Resistor" 0402 1040,851 r270 bottom locked value=220
R105 "Resistor" 0402 1085,851 r270 bottom locked value=130
R106 "Resistor" 0603 750,1605 r270 top locked value=0
R107 "Resistor" 0603 1791.58,1866.03 r90 top locked value=0
R108 "Resistor" 0402 745,1730 r270 top locked value=0
R109 "Resistor" 0402 830,1845 r90 bottom locked value=953k
R110 "Resistor" 0402 816.38,1935 r0 bottom locked value=1.00Meg
R111 "Resistor" 0402 1660.67,1793.5 r270 top value=0
R112 "Resistor" 0603 1327.77,1700.84 r0 top locked value=47
R113 "Resistor" 0402 690,1730 r270 top locked value=0
R114 "Resistor" 0402 730,1845 r270 bottom locked value=180k
R115 "Resistor" 0402 1660.67,1906.9 r270 top locked value=0
R116 "Resistor" 0402 820.75,1605 r90 bottom locked value=0
R117 "Resistor" 0603 1498.23,1878 r90 top locked value=1.00Meg
R118 "Resistor" 0402 716.38,1735 r0 bottom locked value=0
R119 "Resistor" 0603 1569.89,1878 r270 top locked value=255k
R120 "Resistor" 0603 1315,1518.23 r90 bottom locked value=0
R121 "Resistor" 0603 1380,1365.75 r270 bottom locked value=0
R122 "Resistor" 0603 1485,1455.24 r90 bottom locked value=0
R123 "Resistor" 0402 1320,1373.62 r90 bottom locked value=75.0k
R124 "Resistor" 0603 968.5,1538.74 r0 bottom locked value=0
R125 "Resistor" 0603 1385,1518.23 r90 bottom locked value=0
R126 "Resistor" 0402 1265,1268.62 r270 bottom locked value=47k
R127 "Resistor" 0402 971.38,1603.74 r180 top locked value=4.7k
R128 "Resistor" 0603 2023.07,1684.87 r0 top locked value=0
R129 "Resistor" 0603 2023.07,1615.63 r0 top locked value=0
R130 "Resistor" 0402 1896.96,1732.56 r0 top locked value=0
R131 "Resistor" 0402 1896.96,1792.05 r180 top locked value=0
S1 "SW_SPST-single" SW_RS-032G05A3-SM 729.76,432.58 r90 top locked
S2 "SW_SPST-single" SW_RS-032G05A3-SM 301.36,900.39 r90 top locked
SH-8 "881545-2" TE_881545-2 2004.76,1513.68 r180 top locked
SH-J3 "881545-2" TE_881545-2 359.22,1469.98 r0 top
SH-J5 "881545-2" TE_881545-2 1332.51,1852.29 r90 top locked
SH-J7 "881545-2" TE_881545-2 2704,648.04 r0 top
SH-J11 "881545-2" TE_881545-2 2174.27,1708.49 r90 top locked
SH-J12 "881545-2" TE_881545-2 985,1925 r180 top
SH-J13 "881545-2" TE_881545-2 2471,646 r0 top
SH-J14 "881545-2" TE_881545-2 1155,1578.74 r180 top locked
SH-J15 "881545-2" TE_881545-2 1535,1578.74 r180 top locked
SH-J16 "881545-2" TE_881545-2 2937,648.02 r0 top
SH-J17 "881545-2" TE_881545-2 1940.9,1899.79 r180 top locked
TP1 "5002" Keystone5002 1515.82,679.01 r90 top
TP2 "5002" Keystone5002 1515.82,821.53 r90 top
TP3 "5002" Keystone5002 1768,982 r90 top
TP4 "5002" Keystone5002 2264,914.16 r90 top
TP5 "5002" Keystone5002 1725.17,878 r90 top
TP6 "5002" Keystone5002 2318,787 r90 top
TP7 "5002" Keystone5002 1873.34,464 r90 top
TP8 "5002" Keystone5002 1402,984 r90 top
TP9 "5002" Keystone5002 1160.46,1208.98 r90 top
TP10 "5001" Keystone5001 3190,1828.4 r90 top
TP11 "5001" Keystone5001 655,1925 r0 top locked
TP12 "5001" Keystone5001 795,745 r0 top locked
TP13 "5001" Keystone5001 1022.48,1208.98 r0 top locked
U1 "AFE4950YGB" YBG0036-C01 1750,1130 r0 top
U18 "TI-BQ24032ARHL20-3050X2050TP" RHL0020A 372.43,1758.37 r180 bottom
U19 "TXB0104YZT" YZT0012ACAC 1728.4,636.48 r0 top
U20 "TXS0102YZP" YZP0008ADCD 2040.44,603.69 r0 top locked
U21 "TXB0104YZT" YZT0012ACAC 2001.65,823.97 r270 top locked
U22 "TI-TXB0102-YZP0008A-8" YZP0008ADAD 1332.87,1098.66 r180 top locked
U26 "TI-TPD4E004-SON_DRY-6" DRY0006A 625,1020 r180 bottom locked
U27 "TPS3825" DBV0005A_N 342,942.24 r180 bottom locked
U28 "TI-MSP430F552X_A-PN80" PN0080A_N 1150,469.69 r270 bottom locked
U29 "TPS6305x" YFF0012AFAF 820.75,1727.13 r180 top locked
U30 "TPS61099YFF" YFF0006AFAD 1644.92,1705.16 r270 top locked
U31 "TI-TPS7AXX01-YYDGN8-1760X1425TP" DGN0008D_N 1111,1344.24 r180 bottom locked
U32 "TPS727xxYFF" YFF0004AUAB_A1 1912.71,1678.41 r0 top locked
Y1 "Xtal" XTAL_ABS07 1189.37,850.68 r180 bottom locked
Y2 "XTAL_4P_13_G24" ABRACON_ABM3B 716.14,445.47 r0 bottom locked
ZZ1 "This Assembly Note is for PCB labels only" AssemblyNoteLabel 170,3310 r0 top
ZZ2 "These assemblies are ESD sensitive, ESD precautions shall be observed." AssemblyNote 170,3200 r0 top
ZZ3 "These assemblies must be clean and free from flux and all contaminants. Use of no clean flux is not acceptable." AssemblyNote 170,3110 r0 top
ZZ4 "These assemblies must comply with workmanship standards IPC-A-610 Class 2, unless otherwise specified." AssemblyNote 170,3020 r0 top

## Footprints (in the part's own frame and the unit in brackets; to place one, negate y for a bottom-side part, rotate by r counter-clockwise, add the part's x,y. Pads: shape width x height; smd on the part's side, far side on the other; paste and mask are expansions set on the pad)
0201 [mm] "Data from Kemet datasheet CC101_COM dated 7/28/11"
  rect 0.46x0.42 smd mask+0.048: 1(-0.33,0) 2(0.33,0)
  body extent -0.31,-0.16 0.31,0.16, height 0.26
0201_033 [mm] "SMD, 2-Leads, Height 0.33mm"
  rect 0.46x0.42 smd mask+0.048: 1(-0.33,0) 2(0.33,0)
  body extent -0.31,-0.16 0.31,0.16, height 0.33
0402 [mm] "0402 from SM-752 data"
  rect 0.8x0.6 smd: 1(-0.6,0) 2(0.6,0)
  silkscreen extent -1.22,-0.52 1.22,0.52, body extent -0.55,-0.3 0.55,0.3, height 0.6
0402_065 [mm] "0402"
  rect 0.8x0.6 smd: 1(-0.6,0) 2(0.6,0)
  silkscreen extent -1.22,-0.52 1.22,0.52, body extent -0.55,-0.3 0.55,0.3, height 0.65
0402_070 [mil] "SMD, 2-Leads, Body 1.2x0.7mm, Height 0.7mm"
  rect 15x24 smd: 1(-20,0) 2(20,0)
  body extent -24,-14 24,14, height 28
0603 [mm] "0603 from SM-752 data"
  rect 1x0.95 smd: 1(-0.8,0) 2(0.8,0)
  silkscreen extent -1.52,-0.69 1.52,0.69, body extent -0.87,-0.47 0.87,0.47, height 1
0603_HR [mm] "0603"
  rect 0.5x0.9 smd: 1(-0.75,0) 2(0.75,0)
  silkscreen extent -1.35,-0.75 1.35,0.77, body extent -0.82,-0.47 0.82,0.47, height 0.5
2012-10 [mm] "SMD, 2-Leads, Body 2.05x1.3mm"
  rect 1.3x1.5 smd: 1(-0.85,0) 2(0.85,0)
  silkscreen extent -1.4,-1 0.5,1, body extent -1.12,-0.75 1.12,0.75, height 1.01
ABRACON_ABM3B [mm] "ABRACON"
  rrect8% 1.2x1.8 smd: 1(-1.2,2) 2(-1.2,-2) 3(1.2,-2) 4(1.2,2)
  body extent -1.6,-2.5 1.6,2.5, height 1.11
AssemblyNote [mil] "Assembly Note"
AssemblyNoteLabel [mil] "Assembly Note for PCB Labels"
CE_Mark_5mm [mil] "Minimum text height for CE Mark"
  silkscreen extent -138,-98 138,98
CONN_851-43-010-20-001000 [mil] "Mill-max"
  rrect11% 36x70 hole 26 mask+2.36: 1(225,0)
  rrect100% 36x70 hole 26 mask+2.36: 2(175,0) 3(125,0) 4(75,0) 5(25,0) 6(-25,0) 7(-75,0) 8(-125,0) 9(-175,0) 10(-225,0)
  silkscreen extent -257,-209 295,10, body extent -257,-209 258,9, height 88
DBV0005A_N [mm] "SOT23, 5-Leads, Body 2.9x1.6mm, Pitch 0.95mm, Lead Span 2.8mm, IPC Medium Density"
  rrect17% 1x0.6 smd: 1(-1.375,0.95) 2(-1.375,0) 3(-1.375,-0.95) 4(1.375,-0.95) 5(1.375,0.95)
  silkscreen extent -0.25,-1.55 0.25,1.55, body extent -1.42,-1.46 1.42,1.46, height 1.09
DFE201612C [mm] "TOKO"
  rect 0.85x1.6 smd: 1(-0.875,0) 2(0.875,0)
  silkscreen extent -0.23,-0.95 0.2,0.95, body extent -1.1,-0.9 1.1,0.9, height 1.2
DGN0008D_N [mm] "TSOP, 8-Leads, Body 3x3mm, Pitch 0.65mm, Thermal Pad 1.89x1.57mm, IPC Medium Density"
  rrect100% 1.35x0.45 smd: 1(-2.225,0.975) 2(-2.225,0.325) 3(-2.225,-0.325) 4(-2.225,-0.975) 5(2.225,-0.975) 6(2.225,-0.325) 7(2.225,0.325) 8(2.225,0.975)
  rrect6% 1.57x1.89 smd: 9(0,0)
  silkscreen extent -2.73,-1.55 0.95,1.55, body extent -2.46,-1.5 2.46,1.5, height 1.1
DPY0002A#1 [mm] "X1SON-2"
  rrect57% 0.35x0.6 smd paste-0.5 mask-0.05: 1(-0.325,0) 2(0.325,0)
  rrect33% 0.3x0.5 on Bottom Paste: 1S(-0.35,0) 2S(0.35,0)
  silkscreen extent -0.85,-0.03 -0.8,0.02, body extent -0.5,-0.3 0.5,0.3, height 0.45
DPY0002A#2 [mm] "X1SON-2"
  rrect57% 0.35x0.6 smd paste-0.5 mask-0.05: 1(-0.325,0) 2(0.325,0)
  rrect33% 0.3x0.5 on Top Paste: 1S(-0.35,0) 2S(0.35,0)
  silkscreen extent -0.85,-0.02 -0.8,0.02, body extent -0.5,-0.3 0.5,0.3, height 0.45
DRY0006A [mm] "PSON, 6-Leads, Body 1x1.45mm, Pitch 0.5mm, TI Recommended"
  rrect50% 0.35x0.2 smd: 1(-0.275,0.5)
  rrect50% 0.3x0.2 smd: 2(-0.3,0) 3(-0.3,-0.5) 4(0.3,-0.5) 5(0.3,0) 6(0.3,0.5)
  body extent -0.5,-0.72 0.5,0.73, height 0.58
FCC_disclaimer [mil]
FCI_10118193-0001LF [mm] "Connector, Receptacle, USB Micro B, R/A, SMT"
  rect 0.4x1.35 smd: 1(-1.3,4.125) 2(-0.65,4.125) 3(0,4.125) 4(0.65,4.125) 5(1.3,4.125)
  oval 0.9x1.6 hole 0.5 slot 1.2 at 90 deg: 6(-3.3,1.45) 7(3.3,1.45)
  rect 1.6x1.4 smd: 8(-3.2,3.9) 9(3.2,3.9)
  rect 1.9x1.7 smd: 10(-1.2,1.45) 11(1.2,1.45)
  silkscreen extent -4.3,0.2 4.3,5.4, body extent -3.93,-1.45 3.93,4.5, height 3.51
Fiducial10-30 [mm]
  round 1 smd mask+1: 1(0,0)
  Top Layer keep-out circle w1.678: c0,0 r0.75
Keystone5001 [mil] "For Keystone 500x miniature loop terminals"
  round 80 hole 40: 1(0,0)
  silkscreen extent -52,-52 52,52, body extent -49,-49 49,49, height 182
Keystone5002 [mil] "For Keystone 500x miniature loop terminals"
  round 80 hole 40: 1(0,0)
  silkscreen extent -52,-52 52,52, body extent -49,-49 49,49, height 182
Label_650x200 [mil] "Thermal Transfer Label"
  round 1 on Mech13: 0(0,0)
  silkscreen extent -325,-100 325,100, body extent -325,-100 325,100, height 1
LED_SML-LX0603GW [mm] "LUMEX OPTO"
  rect 0.8x0.8 smd: 1(-0.75,0) 2(0.75,0)
  silkscreen extent 1.4,-0.4 1.8,0.4, body extent -0.8,-0.4 0.8,0.4, height 0.6
LPS3010 [mm] "Coilcraft recommended land pattern.  Document 428-2, rev 10/6/08"
  rect 0.63x3.3 smd: 1(-1.335,0) 2(1.335,0)
  rect 1.14x0.64 smd: 1(-1.08,-1.33) 1(-1.08,1.33) 2(1.08,-1.33) 2(1.08,1.33)
  silkscreen extent -2.59,-2 2,2, body extent -1.58,-1.58 1.58,1.58, height 1.02
MMZ1005-E [mm] "SMD, 2-Leads, Body 1x0.5mm"
  rrect20% 0.5x0.5 smd: 1(-0.45,0) 2(0.45,0)
  body extent -0.53,-0.28 0.53,0.28, height 0.55
PlasticsOne_41828 [mm] "Touchproof Jack, R/A, TH"
  round 3 hole 2: 1(0,5.1)
  round 2.325 hole 1.55: 2(-2.5,-5.1) 3(2.5,-5.1)
  body extent -3.95,-12.29 3.95,6.79, height 6.4
PN0080A_N [mm] "QFP, 80-Leads, Body 12x12mm, Pitch 0.5mm, IPC Medium Density"
  oval 1.45x0.3 smd: 1(-6.725,4.75) 2(-6.725,4.25) 3(-6.725,3.75) 4(-6.725,3.25) 5(-6.725,2.75) 6(-6.725,2.25) 7(-6.725,1.75) 8(-6.725,1.25) 9(-6.725,0.75) 10(-6.725,0.25) 11(-6.725,-0.25) 12(-6.725,-0.75) 13(-6.725,-1.25) 14(-6.725,-1.75) 15(-6.725,-2.25) 16(-6.725,-2.75) 17(-6.725,-3.25) 18(-6.725,-3.75) 19(-6.725,-4.25) 20(-6.725,-4.75) 41(6.725,-4.75) 42(6.725,-4.25) 43(6.725,-3.75) 44(6.725,-3.25) 45(6.725,-2.75) 46(6.725,-2.25) 47(6.725,-1.75) 48(6.725,-1.25) 49(6.725,-0.75) 50(6.725,-0.25) 51(6.725,0.25) 52(6.725,0.75) 53(6.725,1.25) 54(6.725,1.75) 55(6.725,2.25) 56(6.725,2.75) 57(6.725,3.25) 58(6.725,3.75) 59(6.725,4.25) 60(6.725,4.75)
  oval 0.3x1.45 smd: 21(-4.75,-6.725) 22(-4.25,-6.725) 23(-3.75,-6.725) 24(-3.25,-6.725) 25(-2.75,-6.725) 26(-2.25,-6.725) 27(-1.75,-6.725) 28(-1.25,-6.725) 29(-0.75,-6.725) 30(-0.25,-6.725) 31(0.25,-6.725) 32(0.75,-6.725) 33(1.25,-6.725) 34(1.75,-6.725) 35(2.25,-6.725) 36(2.75,-6.725) 37(3.25,-6.725) 38(3.75,-6.725) 39(4.25,-6.725) 40(4.75,-6.725) 61(4.75,6.725) 62(4.25,6.725) 63(3.75,6.725) 64(3.25,6.725) 65(2.75,6.725) 66(2.25,6.725) 67(1.75,6.725) 68(1.25,6.725) 69(0.75,6.725) 70(0.25,6.725) 71(-0.25,6.725) 72(-0.75,6.725) 73(-1.25,6.725) 74(-1.75,6.725) 75(-2.25,6.725) 76(-2.75,6.725) 77(-3.25,6.725) 78(-3.75,6.725) 79(-4.25,6.725) 80(-4.75,6.725)
  silkscreen extent -6.85,-5.6 5.6,5.6, body extent -7,-7 7,7, height 1.56
RHL0020A [mm] "QFN, 20-Leads, Body 4.5x3.5mm, Pitch 0.5mm, Thermal Pad 3.05x2.05mm, TI Recommended"
  rrect42% 0.24x0.6 smd: 1(-0.75,2.15) 10(-0.75,-2.15) 11(0.75,-2.15) 20(0.75,2.15)
  rrect42% 0.6x0.24 smd: 2(-1.65,1.75) 3(-1.65,1.25) 4(-1.65,0.75) 5(-1.65,0.25) 6(-1.65,-0.25) 7(-1.65,-0.75) 8(-1.65,-1.25) 9(-1.65,-1.75) 12(1.65,-1.75) 13(1.65,-1.25) 14(1.65,-0.75) 15(1.65,-0.25) 16(1.65,0.25) 17(1.65,0.75) 18(1.65,1.25) 19(1.65,1.75)
  rrect12% 0.92x0.85 on Bottom Paste: 21(-0.56,-1.05) 21(-0.56,0) 21(-0.56,1.05) 21(0.56,-1.05) 21(0.56,0) 21(0.56,1.05)
  rrect5% 2.05x3.05 smd paste-2 mask+0: 21(0,0)
  Top Layer region: -0.975,-1.575 -0.425,-1.575 -0.425,-2.4 -0.417,-2.438 -0.396,-2.471 -0.363,-2.492 -0.325,-2.5 -0.325,-2.5 -0.225,-2.5 -0.187,-2.492 -0.154,-2.471 -0.133,-2.438 -0.125,-2.4 -0.125,-2.4 -0.125,-1.975 0.125,-1.975 0.125,-2.4 0.133,-2.438 0.154,-2.471 0.187,-2.492 0.225,-2.5 0.225,-2.5 0.325,-2.5 0.363,-2.492 0.396,-2.471 0.417,-2.438 0.425,-2.4 0.425,-2.4 0.425,-1.575 0.975,-1.575 1.013,-1.567 1.046,-1.546 1.067,-1.513 1.075,-1.475 1.075,-1.475 1.075,1.475 1.067,1.513 1.046,1.546 1.013,1.567 0.975,1.575 0.975,1.575 0.425,1.575 0.425,2.4 0.417,2.438 0.396,2.471 0.363,2.492 0.325,2.5 0.325,2.5 0.225,2.5 0.187,2.492 0.154,2.471 0.133,2.438 0.125,2.4 0.125,2.4 0.125,1.975 -0.125,1.975 -0.125,2.4 -0.133,2.438 -0.154,2.471 -0.187,2.492 -0.225,2.5 -0.225,2.5 -0.325,2.5 -0.363,2.492 -0.396,2.471 -0.417,2.438 -0.425,2.4 -0.425,2.4 -0.425,1.575 -0.975,1.575 -1.013,1.567 -1.046,1.546 -1.067,1.513 -1.075,1.475 -1.075,1.475 -1.075,-1.475 -1.067,-1.513 -1.046,-1.546 -1.013,-1.567 -0.975,-1.575
  silkscreen extent -1.98,-2.47 1.98,2.47, body extent -1.75,-2.25 1.75,2.25, height 1.01
Samtec_TSW-102-07-T-S [mm] "Header, 2.54 mm, 2x1, Tin, TH"
  rrect50% 1.55x1.55 hole 1.02: 1(-1.27,0)
  round 1.55 hole 1.02: 2(1.27,0)
  body extent -2.54,-1.27 2.54,1.27, height 8.38
Samtec_TSW-103-07-T-S [mm] "Header, 2.54 mm, 3x1, TH"
  rrect50% 1.55x1.55 hole 1.02: 1(-2.54,0)
  round 1.55 hole 1.02: 2(0,0) 3(2.54,0)
  body extent -3.81,-1.27 3.81,1.27, height 8.39
SML-LX0603SRW_SuperRed [mm] "Lumex Opto/Components Inc"
  rect 0.8x0.8 smd: 1(-0.75,0) 2(0.75,0)
  silkscreen extent 1.4,-0.53 1.78,0.52, body extent -0.92,-0.53 0.92,0.53, height 1.1
SOD-123 [mm] "On Semi recommended land pattern"
  rect 0.915x1.22 smd: 1(-1.637,0) 2(1.637,0)
  silkscreen extent -2.74,-1.17 2.03,1.17, body extent -1.93,-0.9 1.93,0.9, height 1.35
SOT-23 [mm] "SOT23, 3-Leads, Body 2.9x1.3mm, Pitch 0.95mm, Lead Span 2.5mm, IPC Medium Density"
  rrect50% 1x0.6 smd: 1(-1.2,0.95) 2(-1.2,-0.95) 3(1.2,0)
  silkscreen extent -1.63,-1.5 0.7,1.5, body extent -1.16,-1.45 1.21,1.45, height 1
SW_RS-032G05A3-SM [mm] "SMT, 2-Leads, Body 6x3.5mm, Pin Spacing 8mm"
  rect 2x2 smd: 1(-4,0) 2(4,0)
  silkscreen extent -3,-1.75 3,1.75, body extent -4,-1.75 4,1.75, height 4.3
Tag_TC2050 [mil] "Footprint for Tag-Connect TC2050 cables"
  round 31 smd paste-15.75: 1(-25,100) 2(-25,50) 3(-25,0) 4(-25,-50) 5(-25,-100) 6(25,-100) 7(25,-50) 8(25,0) 9(25,50) 10(25,100)
  round 39 hole 39 unplated: MH1(0,150) MH2(-40,-150) MH3(40,-150)
  round 93.5 hole 93.5 unplated: MH4(-100,150) MH5(100,150) MH6(-100,-75) MH7(100,-75)
  Bottom Layer keep-out region: -147,119.5 -147,180.05 -202.75,180.05 -202.75,119.5
  Bottom Layer keep-out region: 147,180.5 147,119.95 202.75,119.95 202.75,180.5
  Bottom Layer keep-out region: -147,-105.5 -147,-44.95 -202.75,-44.95 -202.75,-105.5
  Bottom Layer keep-out region: 147,-44.5 147,-105.05 202.75,-105.05 202.75,-44.5
  silkscreen extent -177,-243 147,243
TE_881545-2 [mil] "TE"
  round 1 on Mech3: 0(0,0)
  body extent -99,-49 99,49, height 530
TI_Symbol_Overlay_Small [mil]
  silkscreen extent -90,-88 91,88
TSW-104-07-G-S [mm] "Samtec 100mil, 1x4, 230 mil above insulator"
  rrect50% 1.65x1.65 hole 1.016: 1(-3.81,0)
  round 1.65 hole 1.016: 2(-1.27,0) 3(1.27,0) 4(3.81,0)
  body extent -5.08,-1.27 5.08,1.27, height 8.38
WE_LQS_252012 [mm] "SMD, 2-Leads, Body 2.5x2mm, Pitch 1.9mm"
  rect 1.1x2 smd: 1(-0.95,0) 2(0.95,0)
  silkscreen extent -0.1,-1 0.1,1, body extent -1.25,-1 1.25,1, height 1.2
WEEE_Minimum [mil] "WEEElie bin"
  silkscreen extent -95,-172 99,104
XTAL_ABS07 [mm] "ABRACON"
  rect 1.1x1.9 smd: 1(-1.25,0) 2(1.25,0)
  silkscreen extent -0.4,-1 0.4,1, body extent -1.65,-0.8 1.65,0.8, height 0.9
YBG0036-C01 [mm] "DSBGA-36"
  round 0.23 smd paste-0.2 mask+0.038: A1(-1,1) A2(-0.6,1) A3(-0.2,1) A4(0.2,1) A5(0.6,1) A6(1,1) B1(-1,0.6) B2(-0.6,0.6) B3(-0.2,0.6) B4(0.2,0.6) B5(0.6,0.6) B6(1,0.6) C1(-1,0.2) C2(-0.6,0.2) C3(-0.2,0.2) C4(0.2,0.2) C5(0.6,0.2) C6(1,0.2) D1(-1,-0.2) D2(-0.6,-0.2) D3(-0.2,-0.2) D4(0.2,-0.2) D5(0.6,-0.2) D6(1,-0.2) E1(-1,-0.6) E2(-0.6,-0.6) E3(-0.2,-0.6) E4(0.2,-0.6) E5(0.6,-0.6) E6(1,-0.6) F1(-1,-1) F2(-0.6,-1) F3(-0.2,-1) F4(0.2,-1) F5(0.6,-1) F6(1,-1)
  silkscreen extent -1.35,-1.4 1.35,1.4, body extent -1.25,-1.3 1.25,1.3, height 0.5
YFF0004AUAB_A1 [mm] "DSBGA, 4-Balls, Body 1.19x0.82mm"
  round 0.23 smd paste-0.13 mask+0.04: A1(-0.2,0.2) A2(0.2,0.2) B1(-0.2,-0.2) B2(0.2,-0.2)
  silkscreen extent -0.7,-0.5 0.7,0.5, body extent -0.6,-0.41 0.6,0.41, height 0.63
YFF0006AFAD [mm] "DSBGA, 6-Leads, Body 1.226x 0.884mm, Pitch 0.4mm"
  round 0.23 smd paste-0.13 mask+0.038: A1(-0.2,0.4) A2(0.2,0.4) B1(-0.2,0) B2(0.2,0) C1(-0.2,-0.4) C2(0.2,-0.4)
  silkscreen extent -0.61,-0.78 0.61,0.78, body extent -0.46,-0.63 0.46,0.63, height 0.63
YFF0012AFAF [mm] "TI DSBGA 1.716x1.316mm"
  round 0.23 smd paste-0.13 mask+0.038: A1(-0.4,0.6) A2(0,0.6) A3(0.4,0.6) B1(-0.4,0.2) B2(0,0.2) B3(0.4,0.2) C1(-0.4,-0.2) C2(0,-0.2) C3(0.4,-0.2) D1(-0.4,-0.6) D2(0,-0.6) D3(0.4,-0.6)
  silkscreen extent -0.75,-0.95 0.75,0.95, body extent -0.66,-0.86 0.66,0.86, height 0.63
YZP0008ADAD [mm] "BGA, 8-Leads, Body 1.9x0.9mm, Pitch 0.5mm"
  round 0.23 smd paste-0.12: A1(-0.25,0.75) A2(0.25,0.75) B1(-0.25,0.25) B2(0.25,0.25) C1(-0.25,-0.25) C2(0.25,-0.25) D1(-0.25,-0.75) D2(0.25,-0.75)
  silkscreen extent -0.6,-1.1 0.6,1.1, body extent -0.46,-0.96 0.46,0.96, height 0.51
YZP0008ADCD [mm] "BGA, 8-Leads, Body 1.9x0.9mm, Pitch 0.5mm"
  round 0.23 smd paste-0.12: A1(-0.25,0.75) A2(0.25,0.75) B1(-0.25,0.25) B2(0.25,0.25) C1(-0.25,-0.25) C2(0.25,-0.25) D1(-0.25,-0.75) D2(0.25,-0.75)
  silkscreen extent -0.6,-1.1 0.6,1.1, body extent -0.46,-0.96 0.46,0.96, height 0.51
YZT0012ACAC [mm] "WCSP"
  round 0.275 smd paste-0.14 mask+0.05: A1(-0.5,0.75) A2(0,0.75) A3(0.5,0.75) B1(-0.5,0.25) B2(0,0.25) B3(0.5,0.25) C1(-0.5,-0.25) C2(0,-0.25) C3(0.5,-0.25) D1(-0.5,-0.75) D2(0,-0.75) D3(0.5,-0.75)
  silkscreen extent -1.05,0.87 -0.85,1.08, body extent -0.69,-0.94 0.69,0.94, height 0.63